# Altium PCB UHF_Reader_MultiFunction_V4.PcbDoc (part 1 of 3)
Units mm, origin at the board's own origin, x right, y up, seen from the top; angles counter-clockwise.
Board outline 74.4 x 63.4 mm, 6 copper layers (Top Layer, Internal Plane 1, Signal Layer 1, Signal Layer 2, Signal Layer 3, Bottom Layer), stack 1.21 mm thick; 381 components, 239 nets, 1152 pads, 1873 vias.
Unrouted connection lines stored in the file: 49.
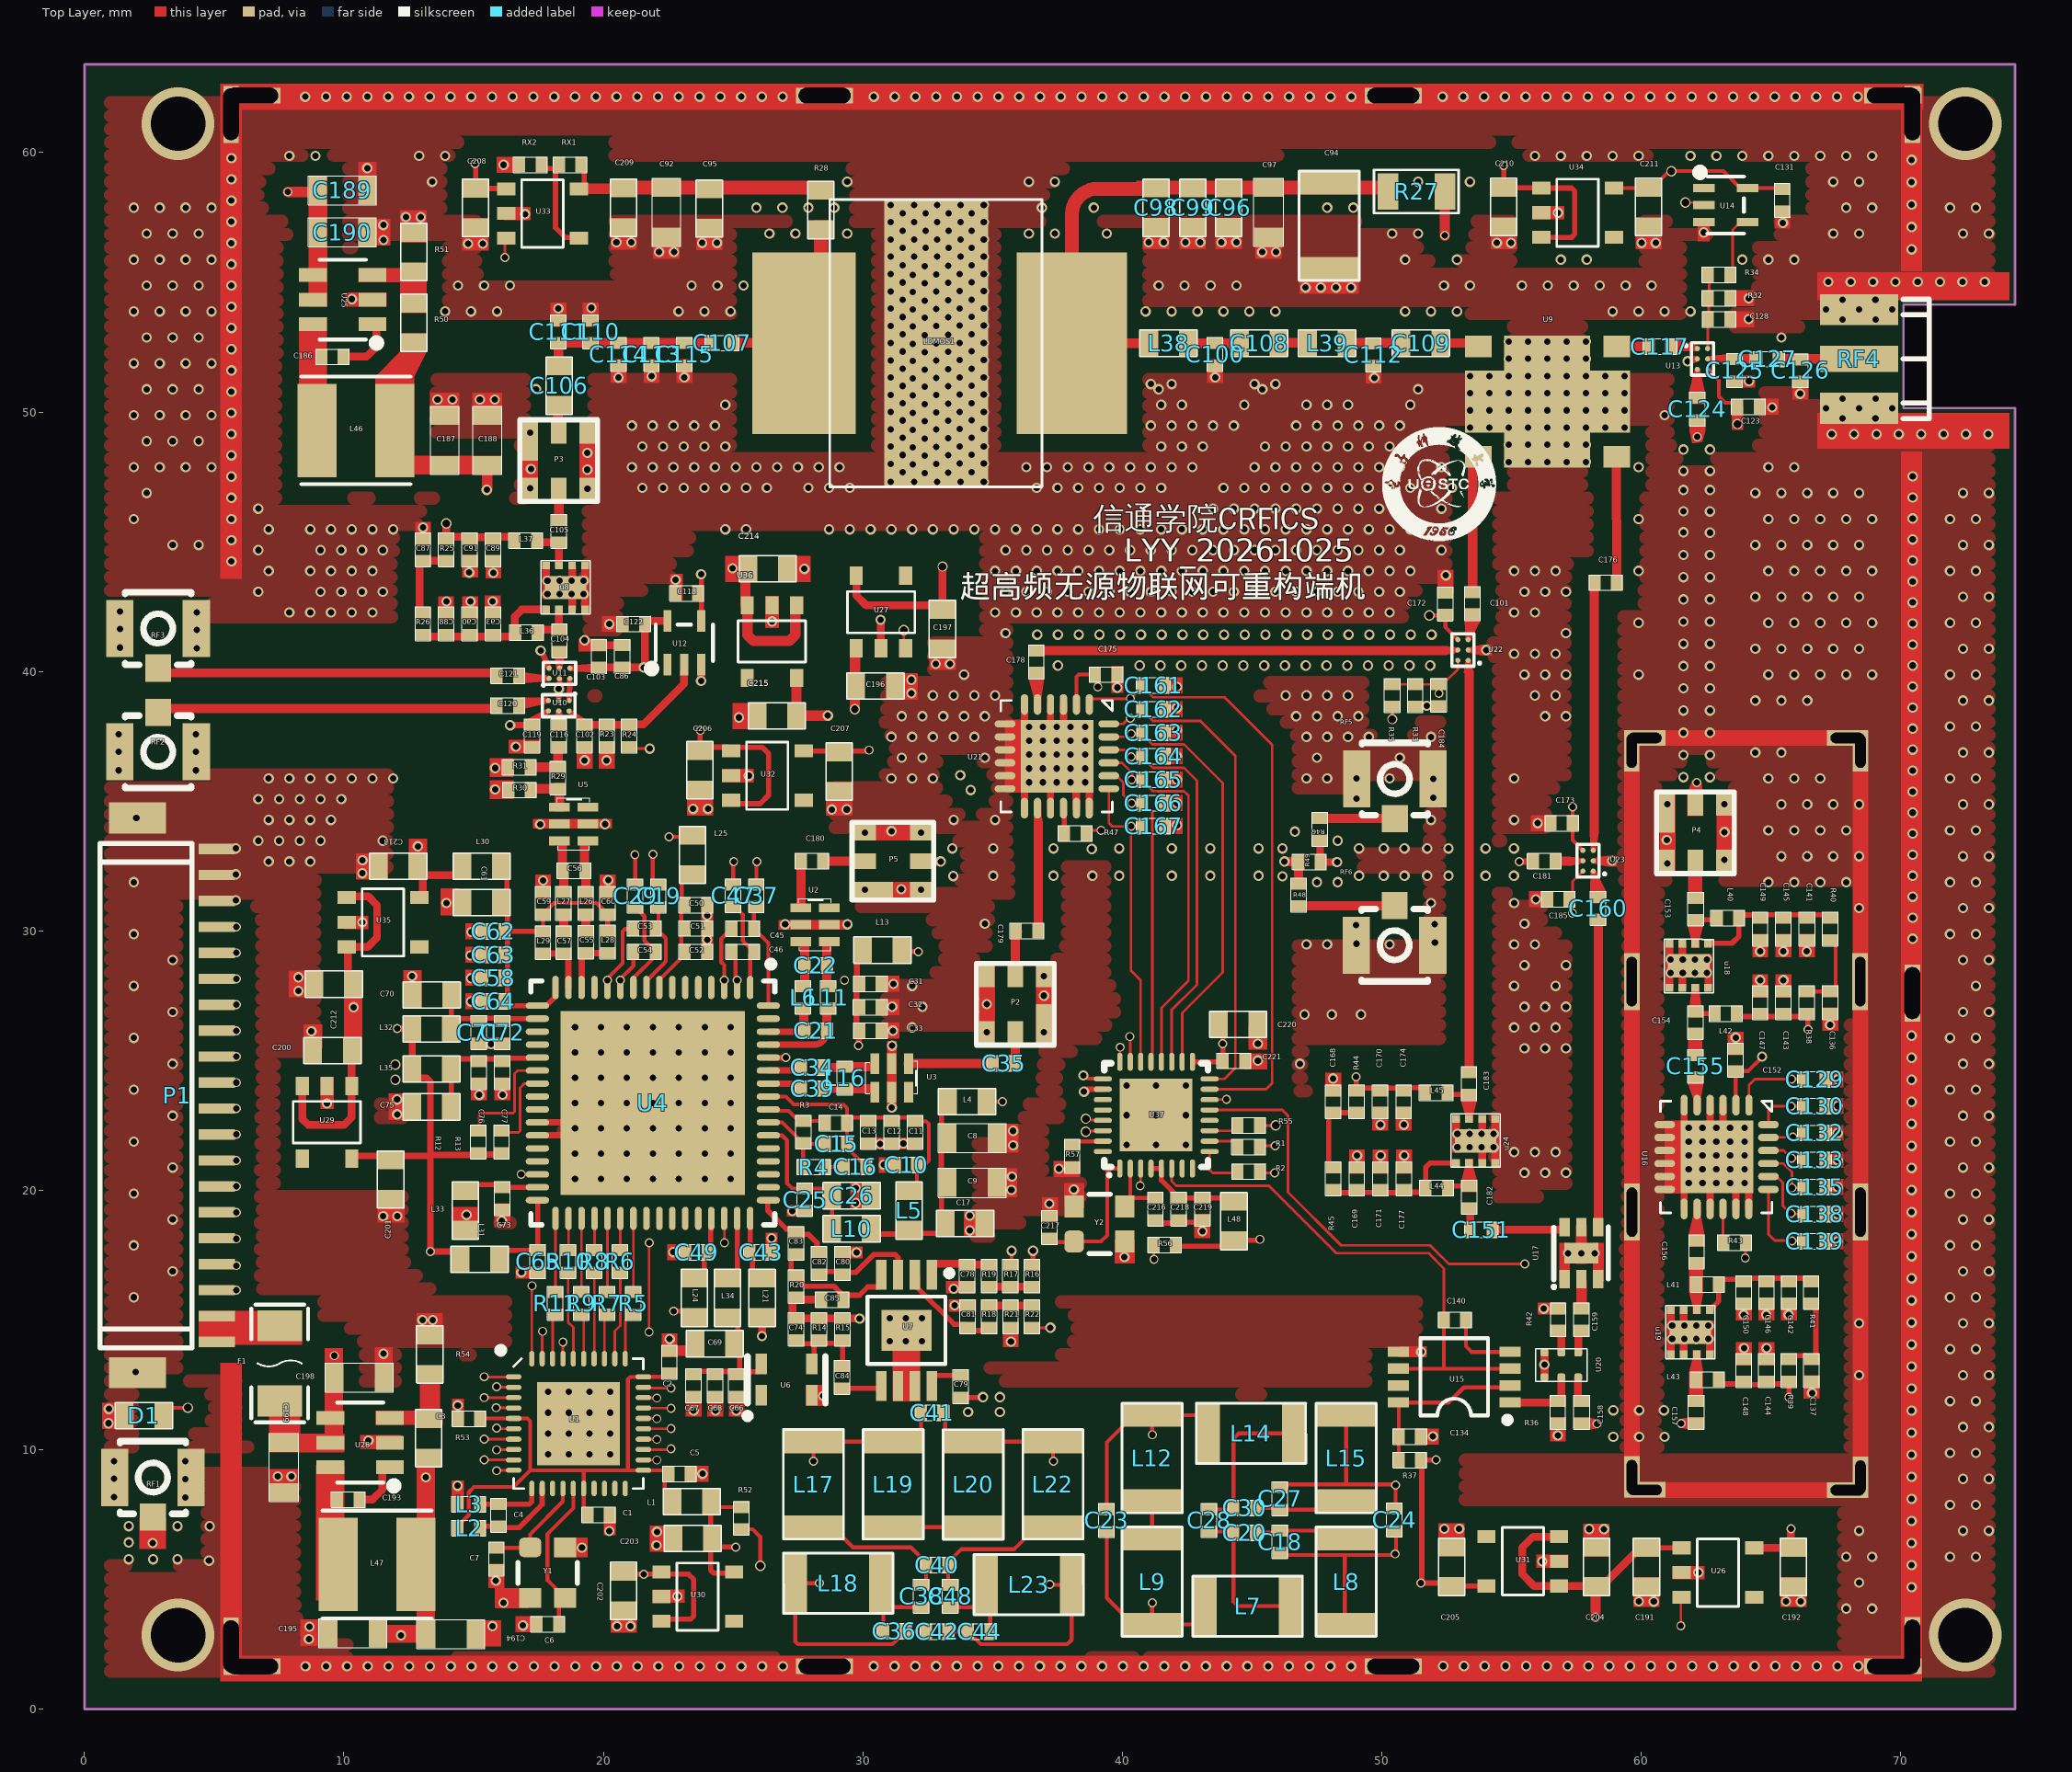
[diagram p0: Top Layer view]
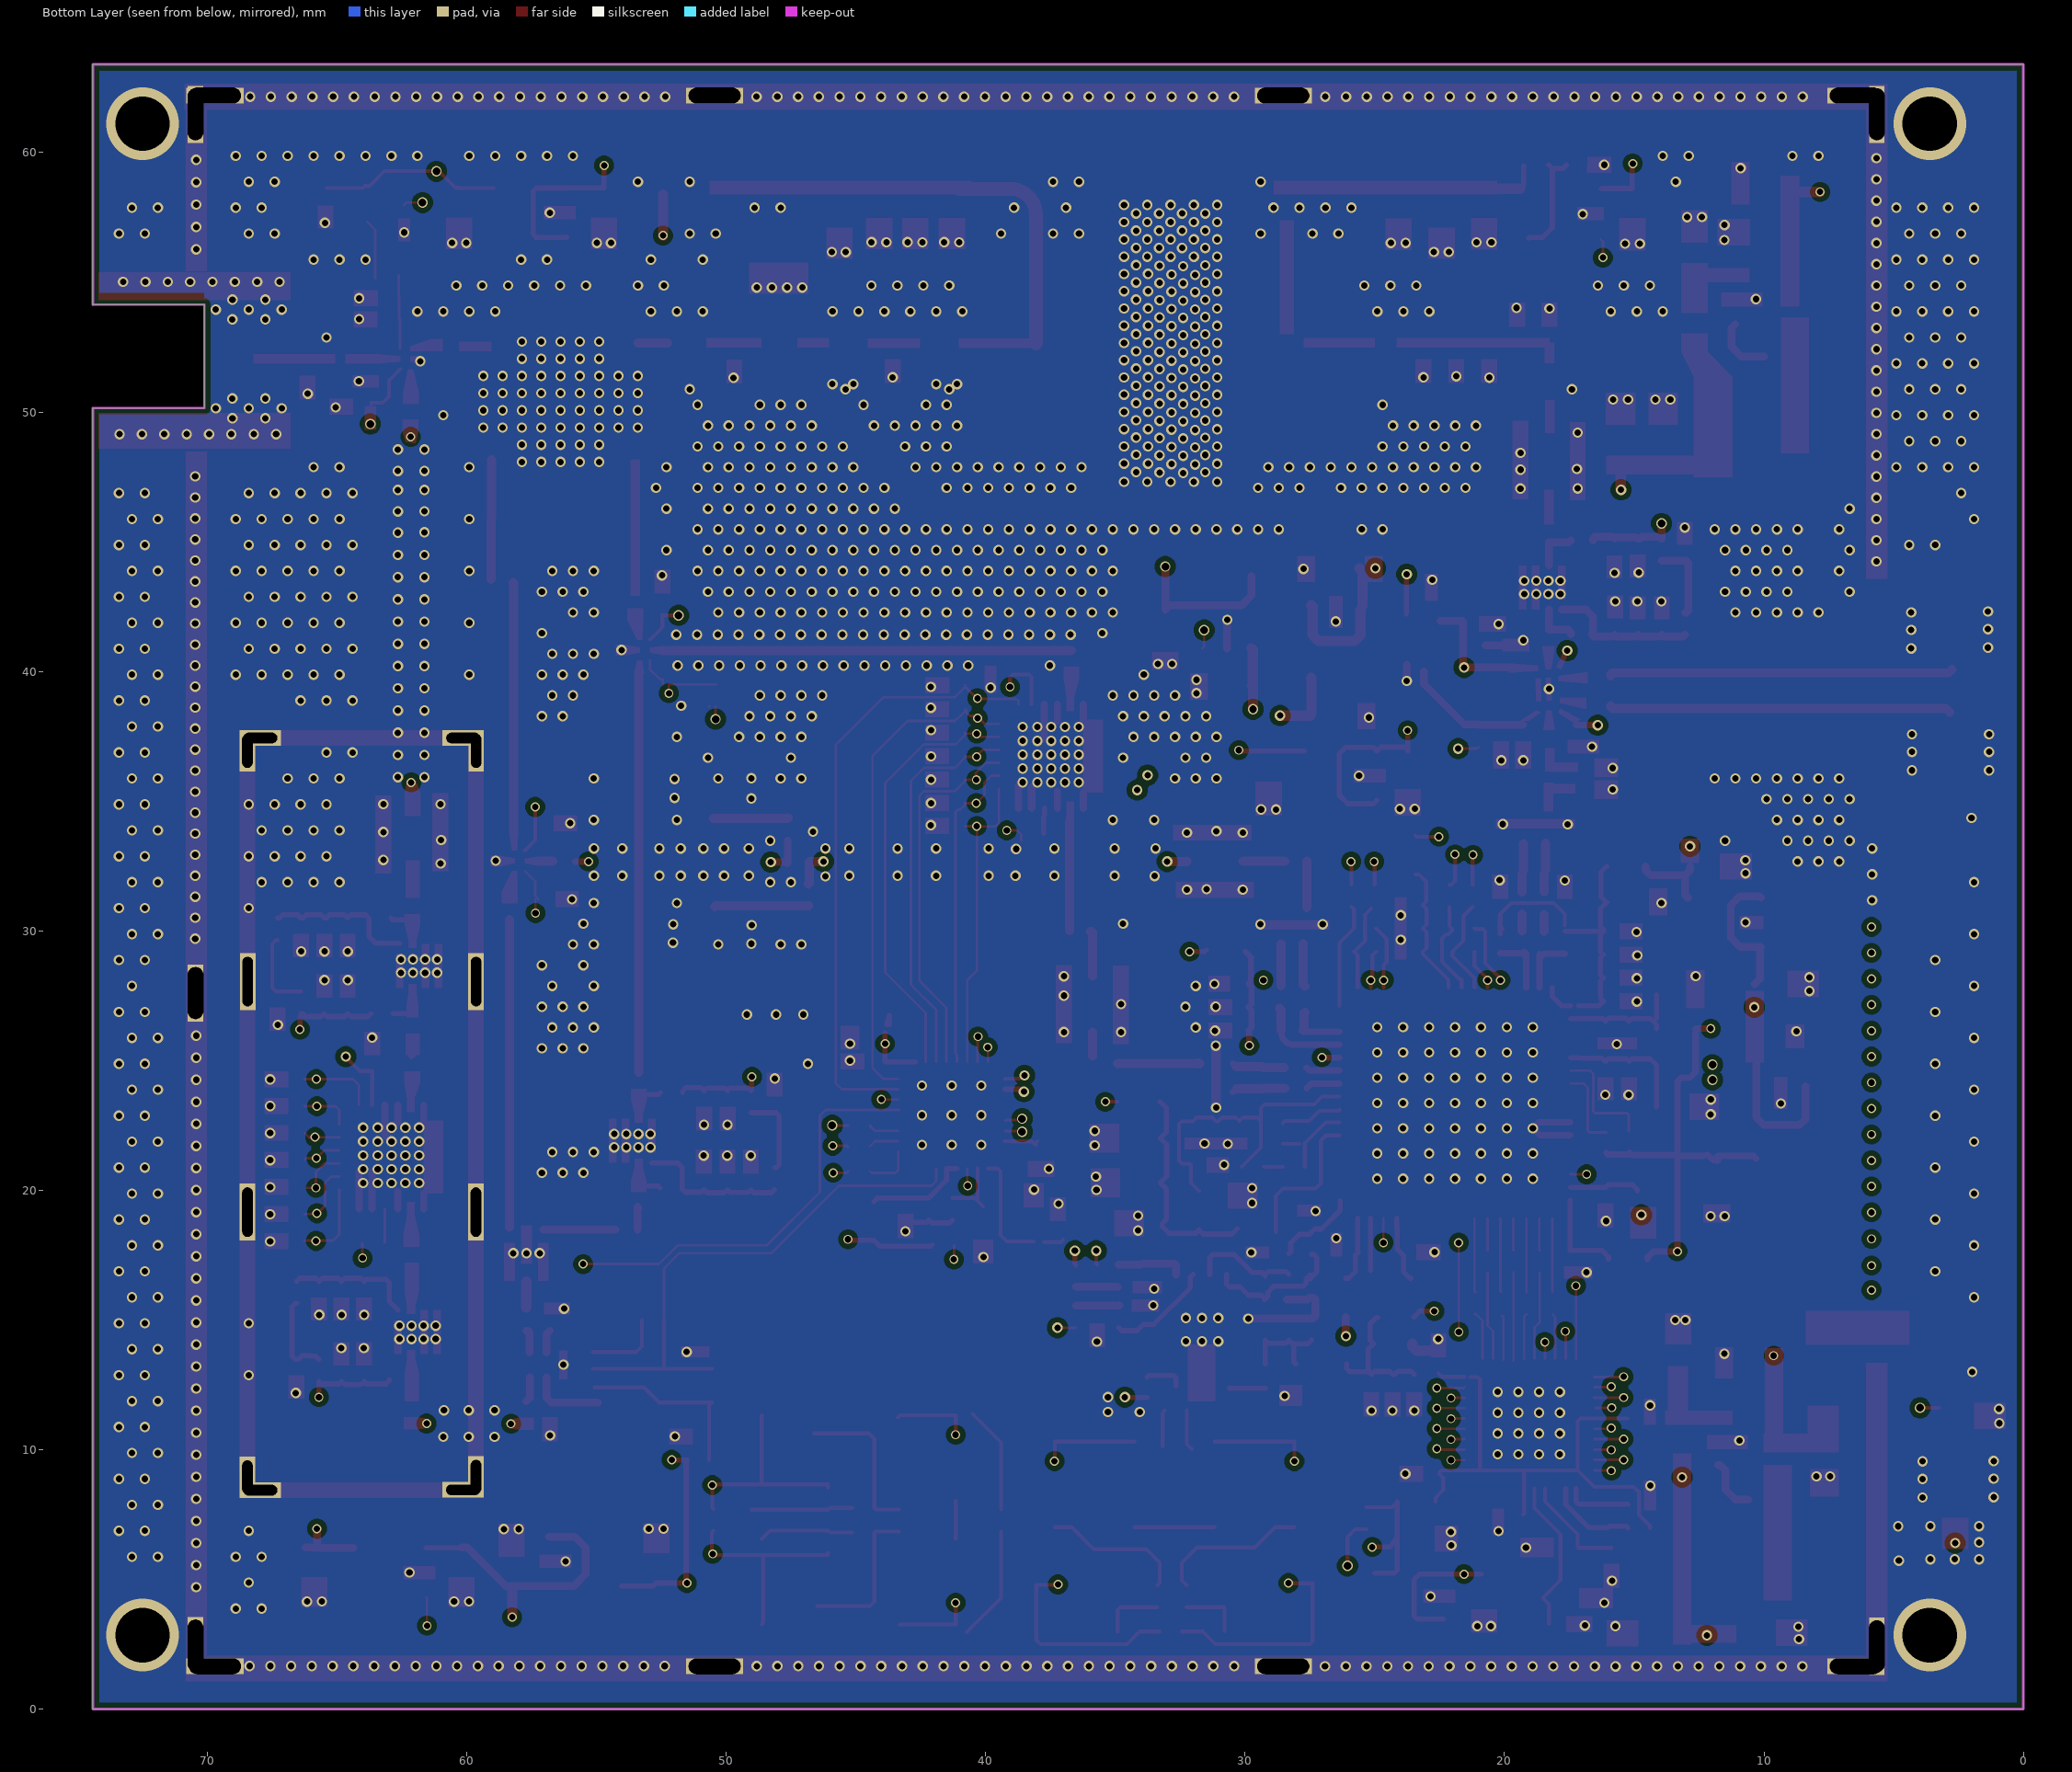
[diagram p1: Bottom Layer view, seen from below]
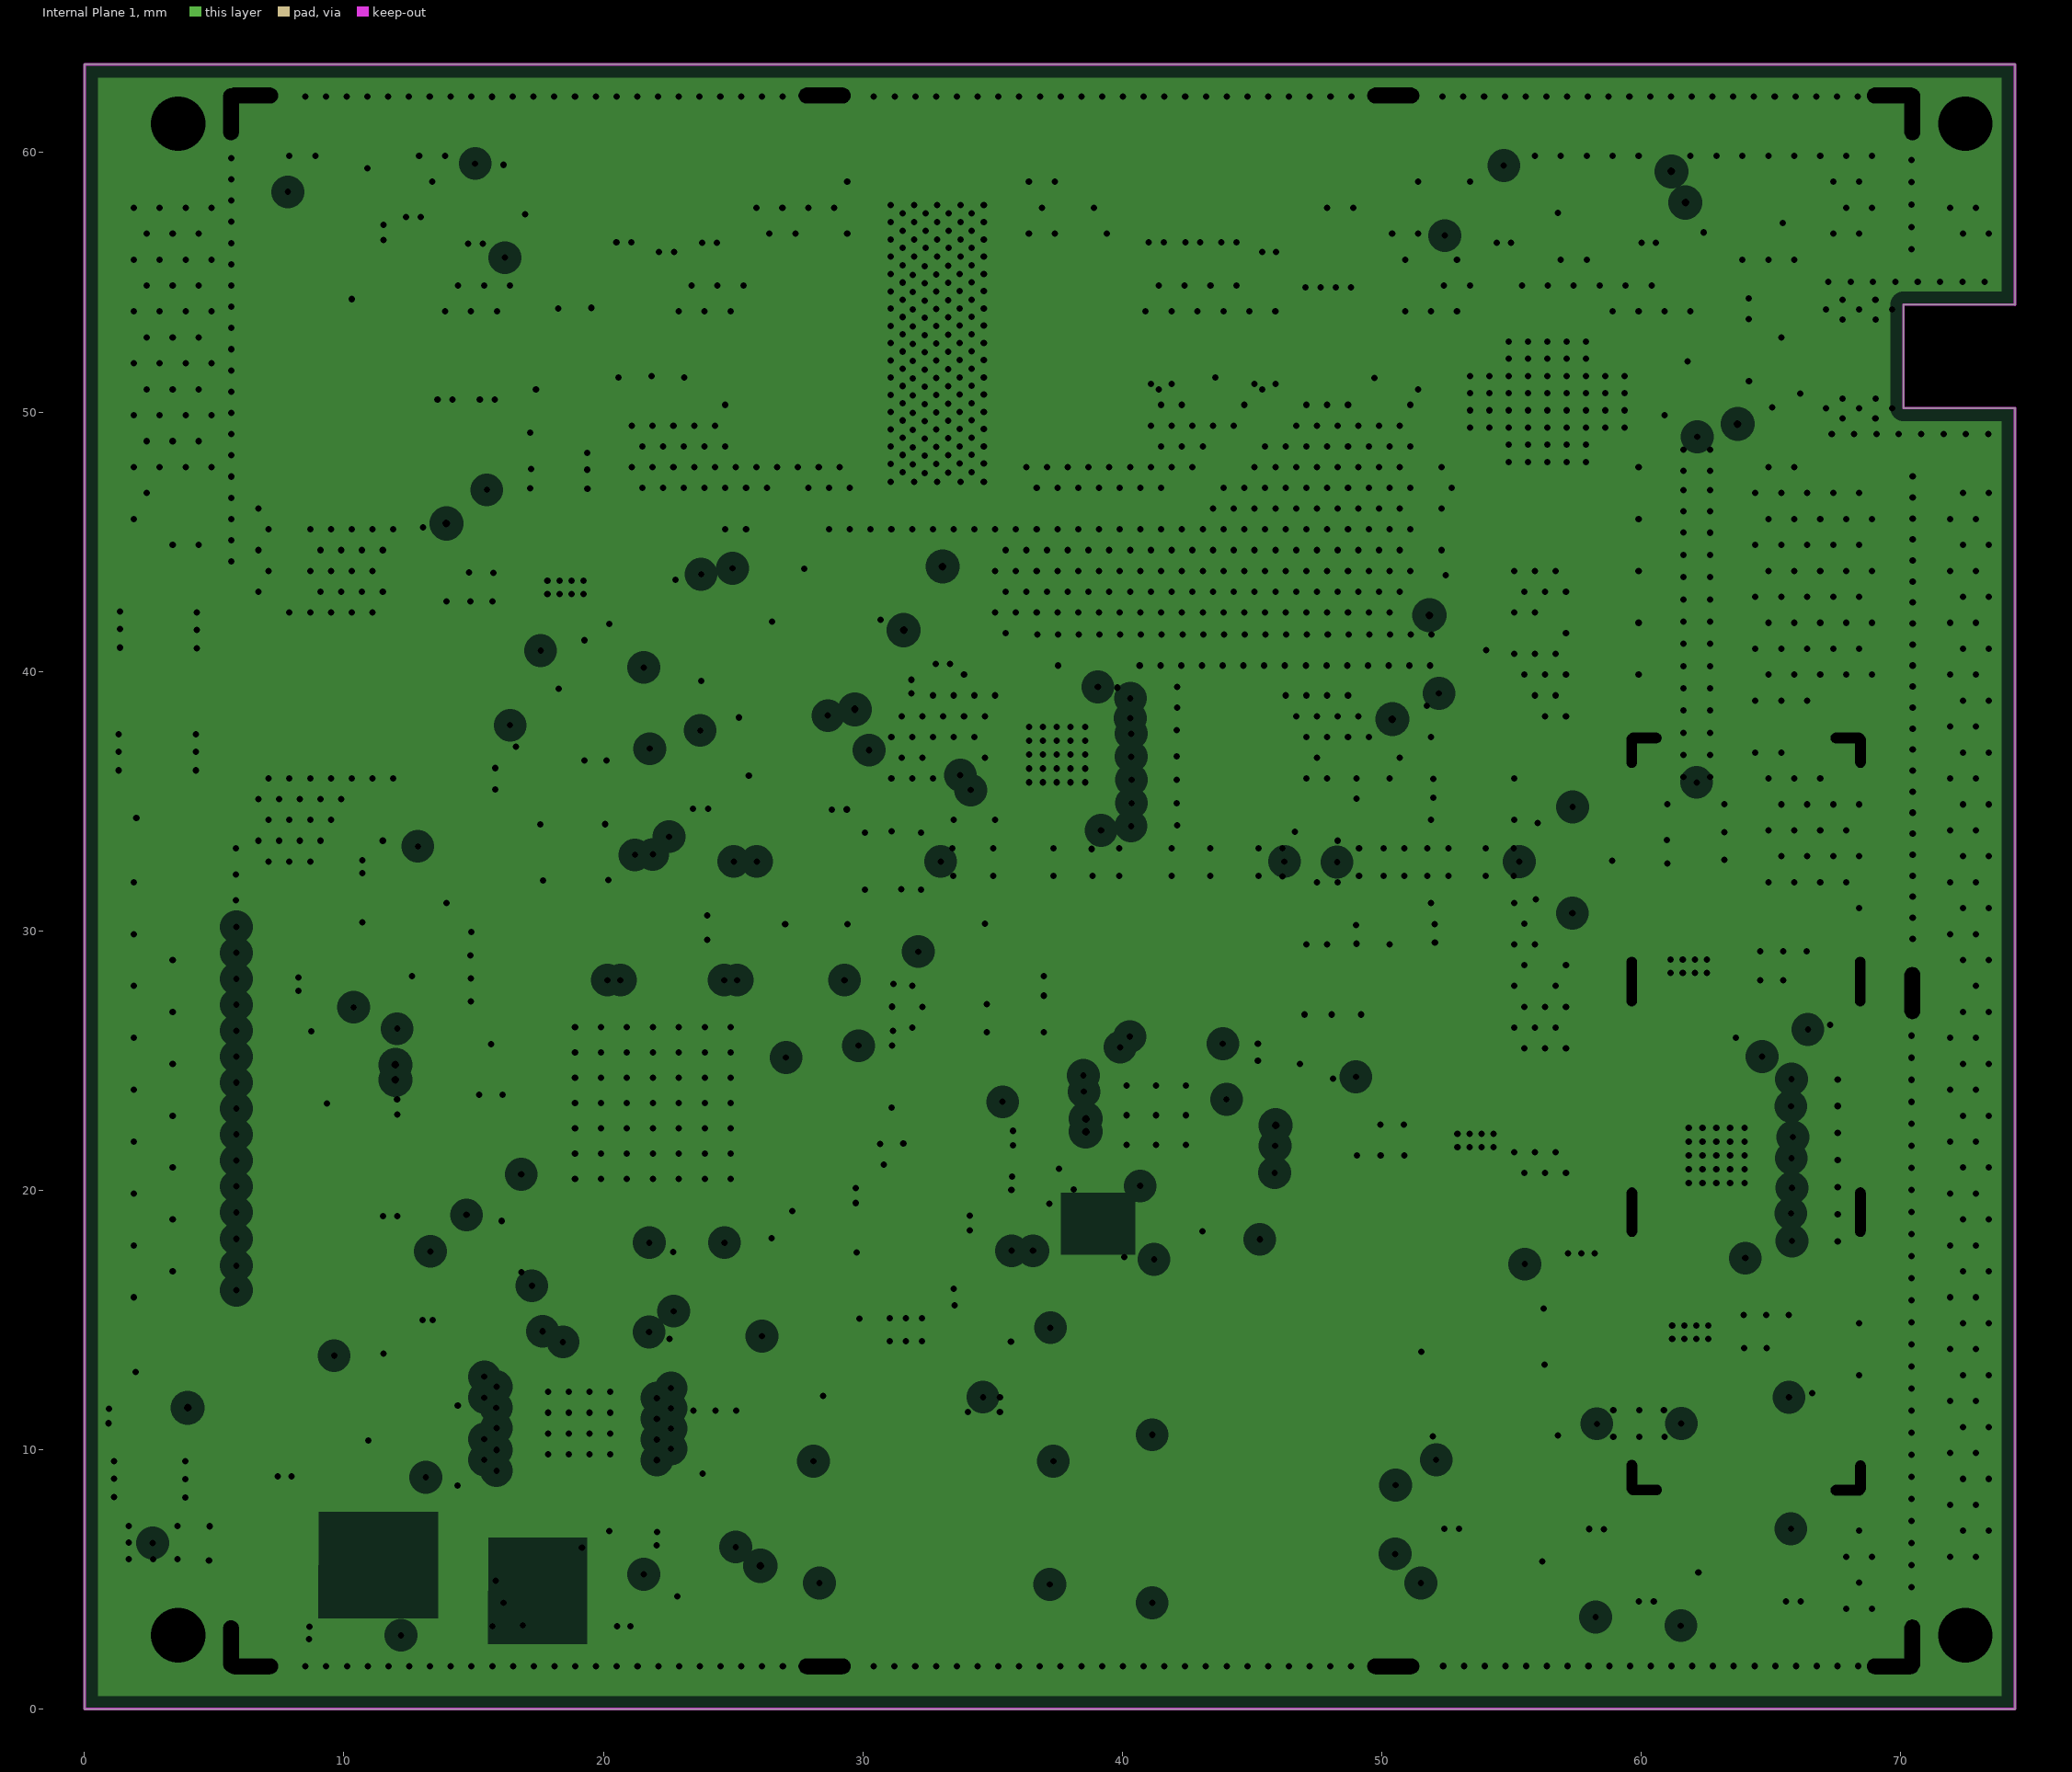
[diagram p2: Internal Plane 1, clearances drawn from the general rule]
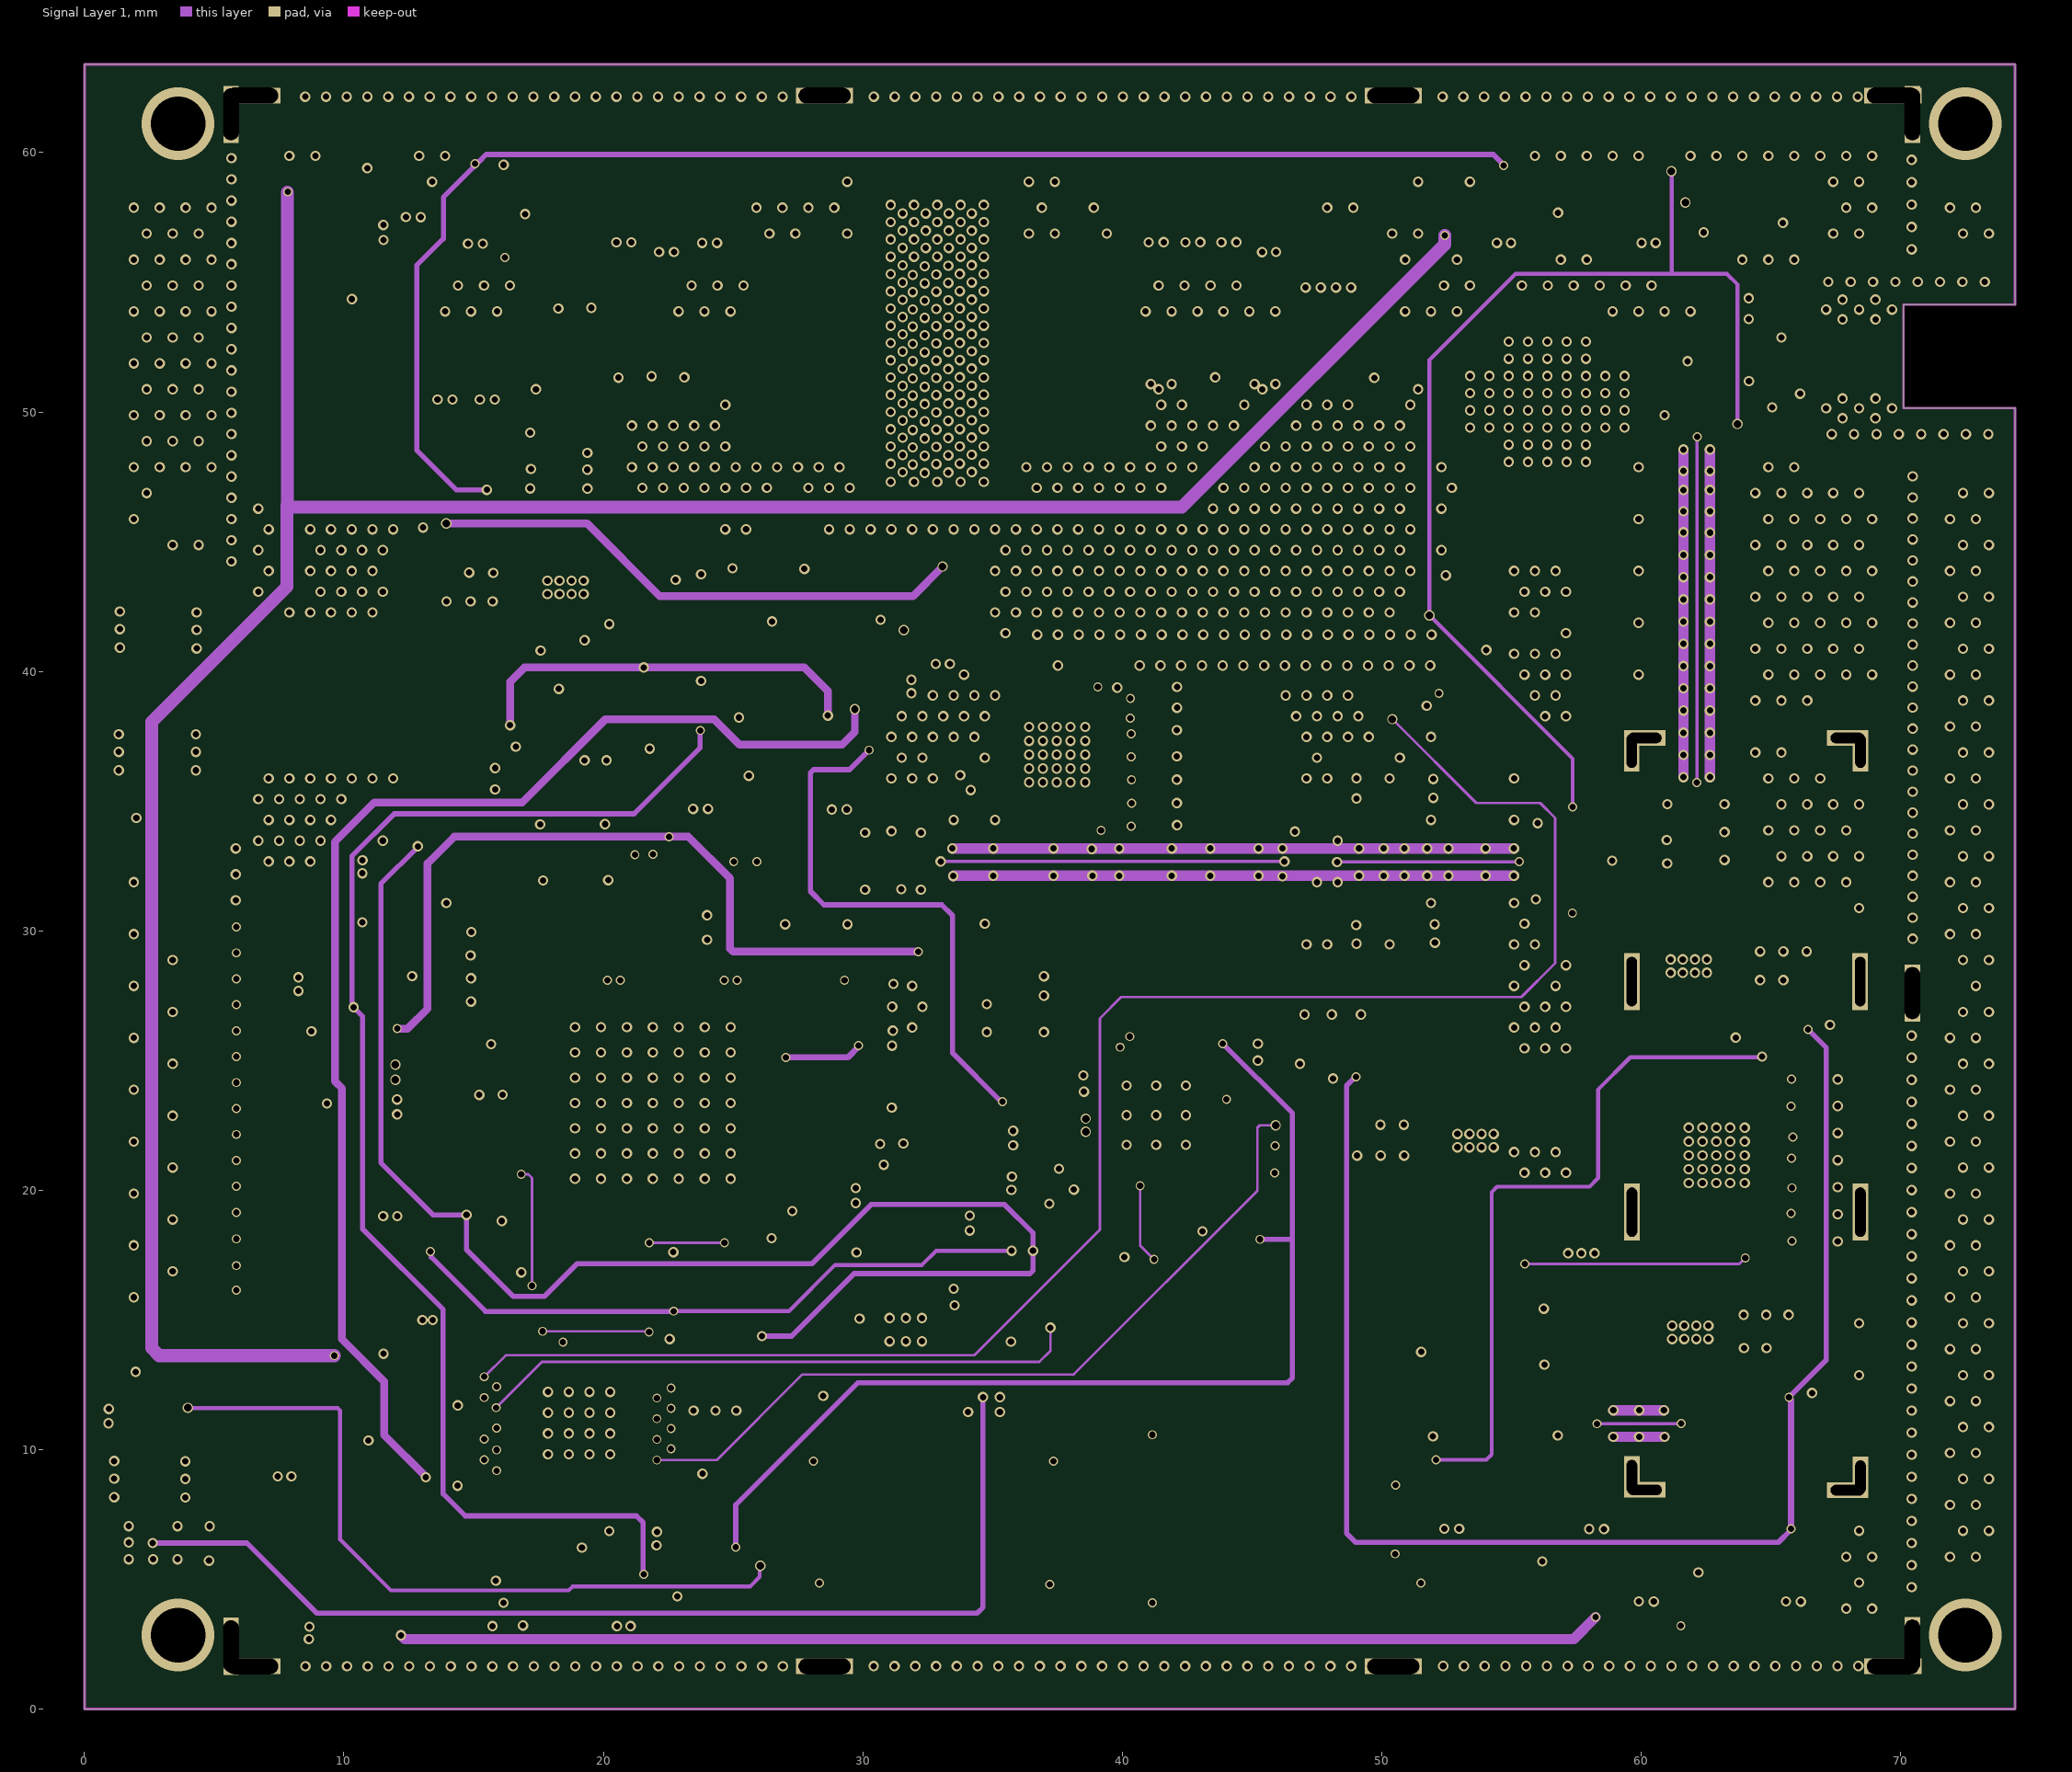
[diagram p3: Signal Layer 1]
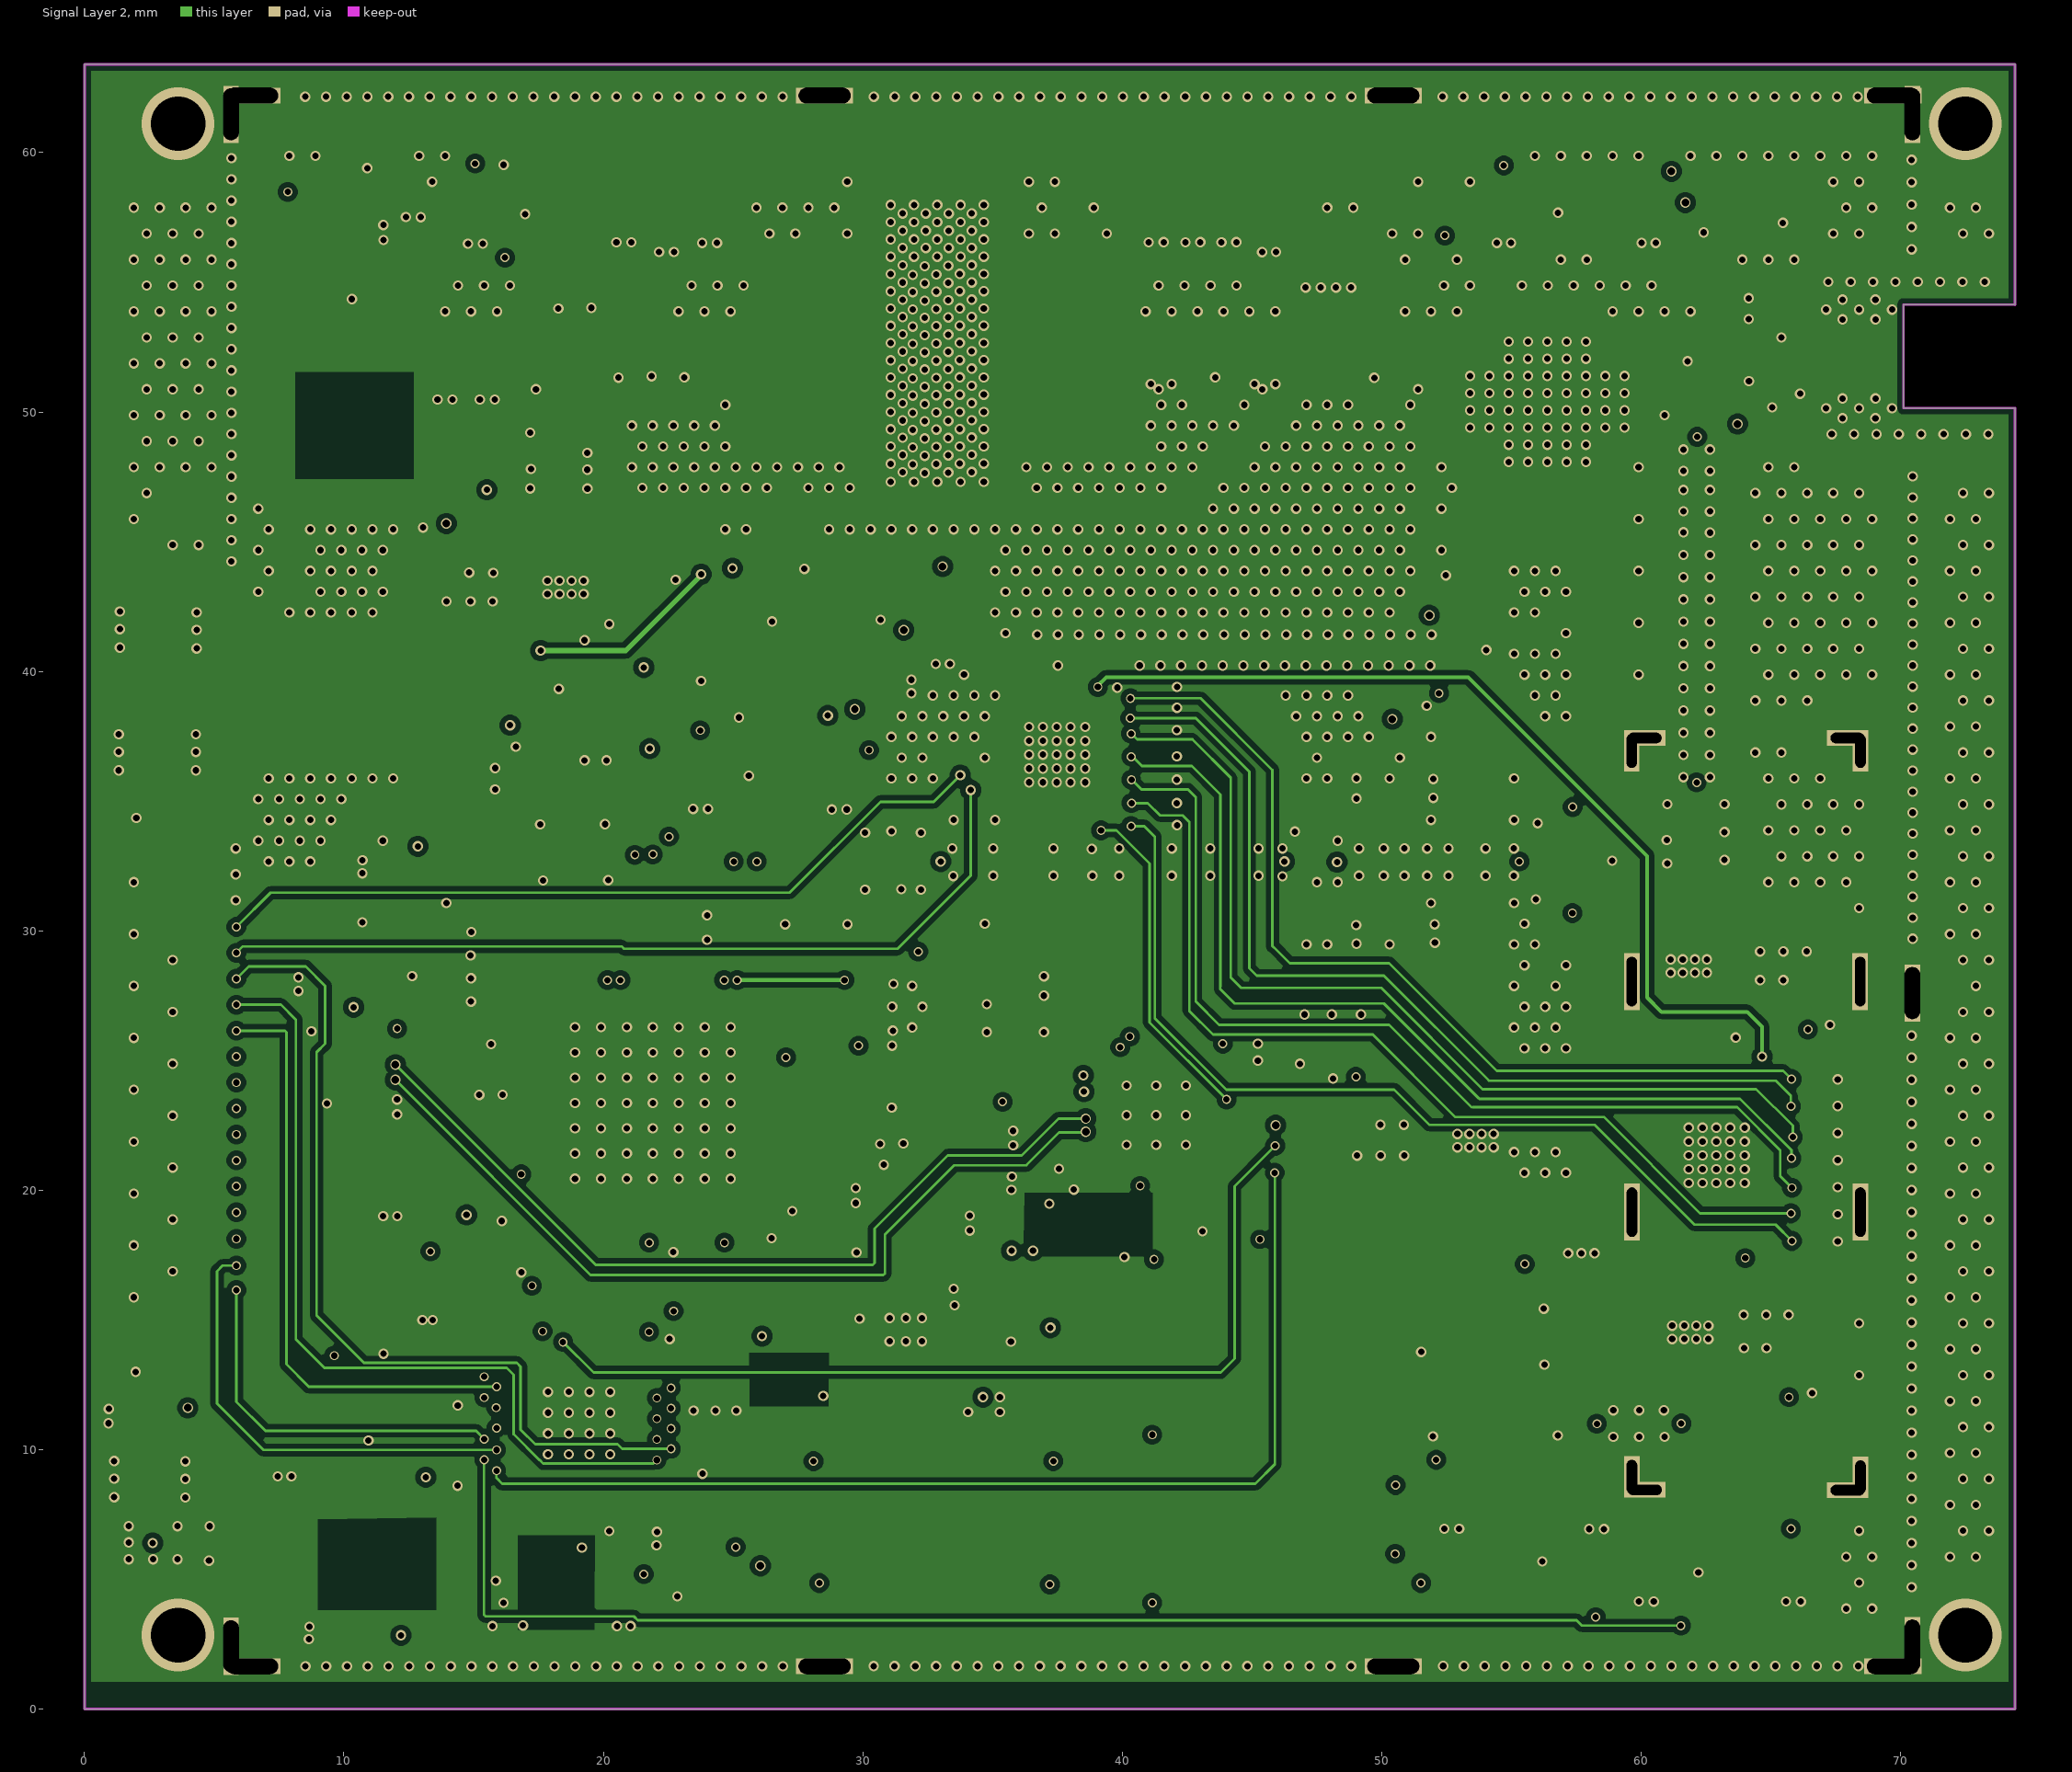
[diagram p4: Signal Layer 2]
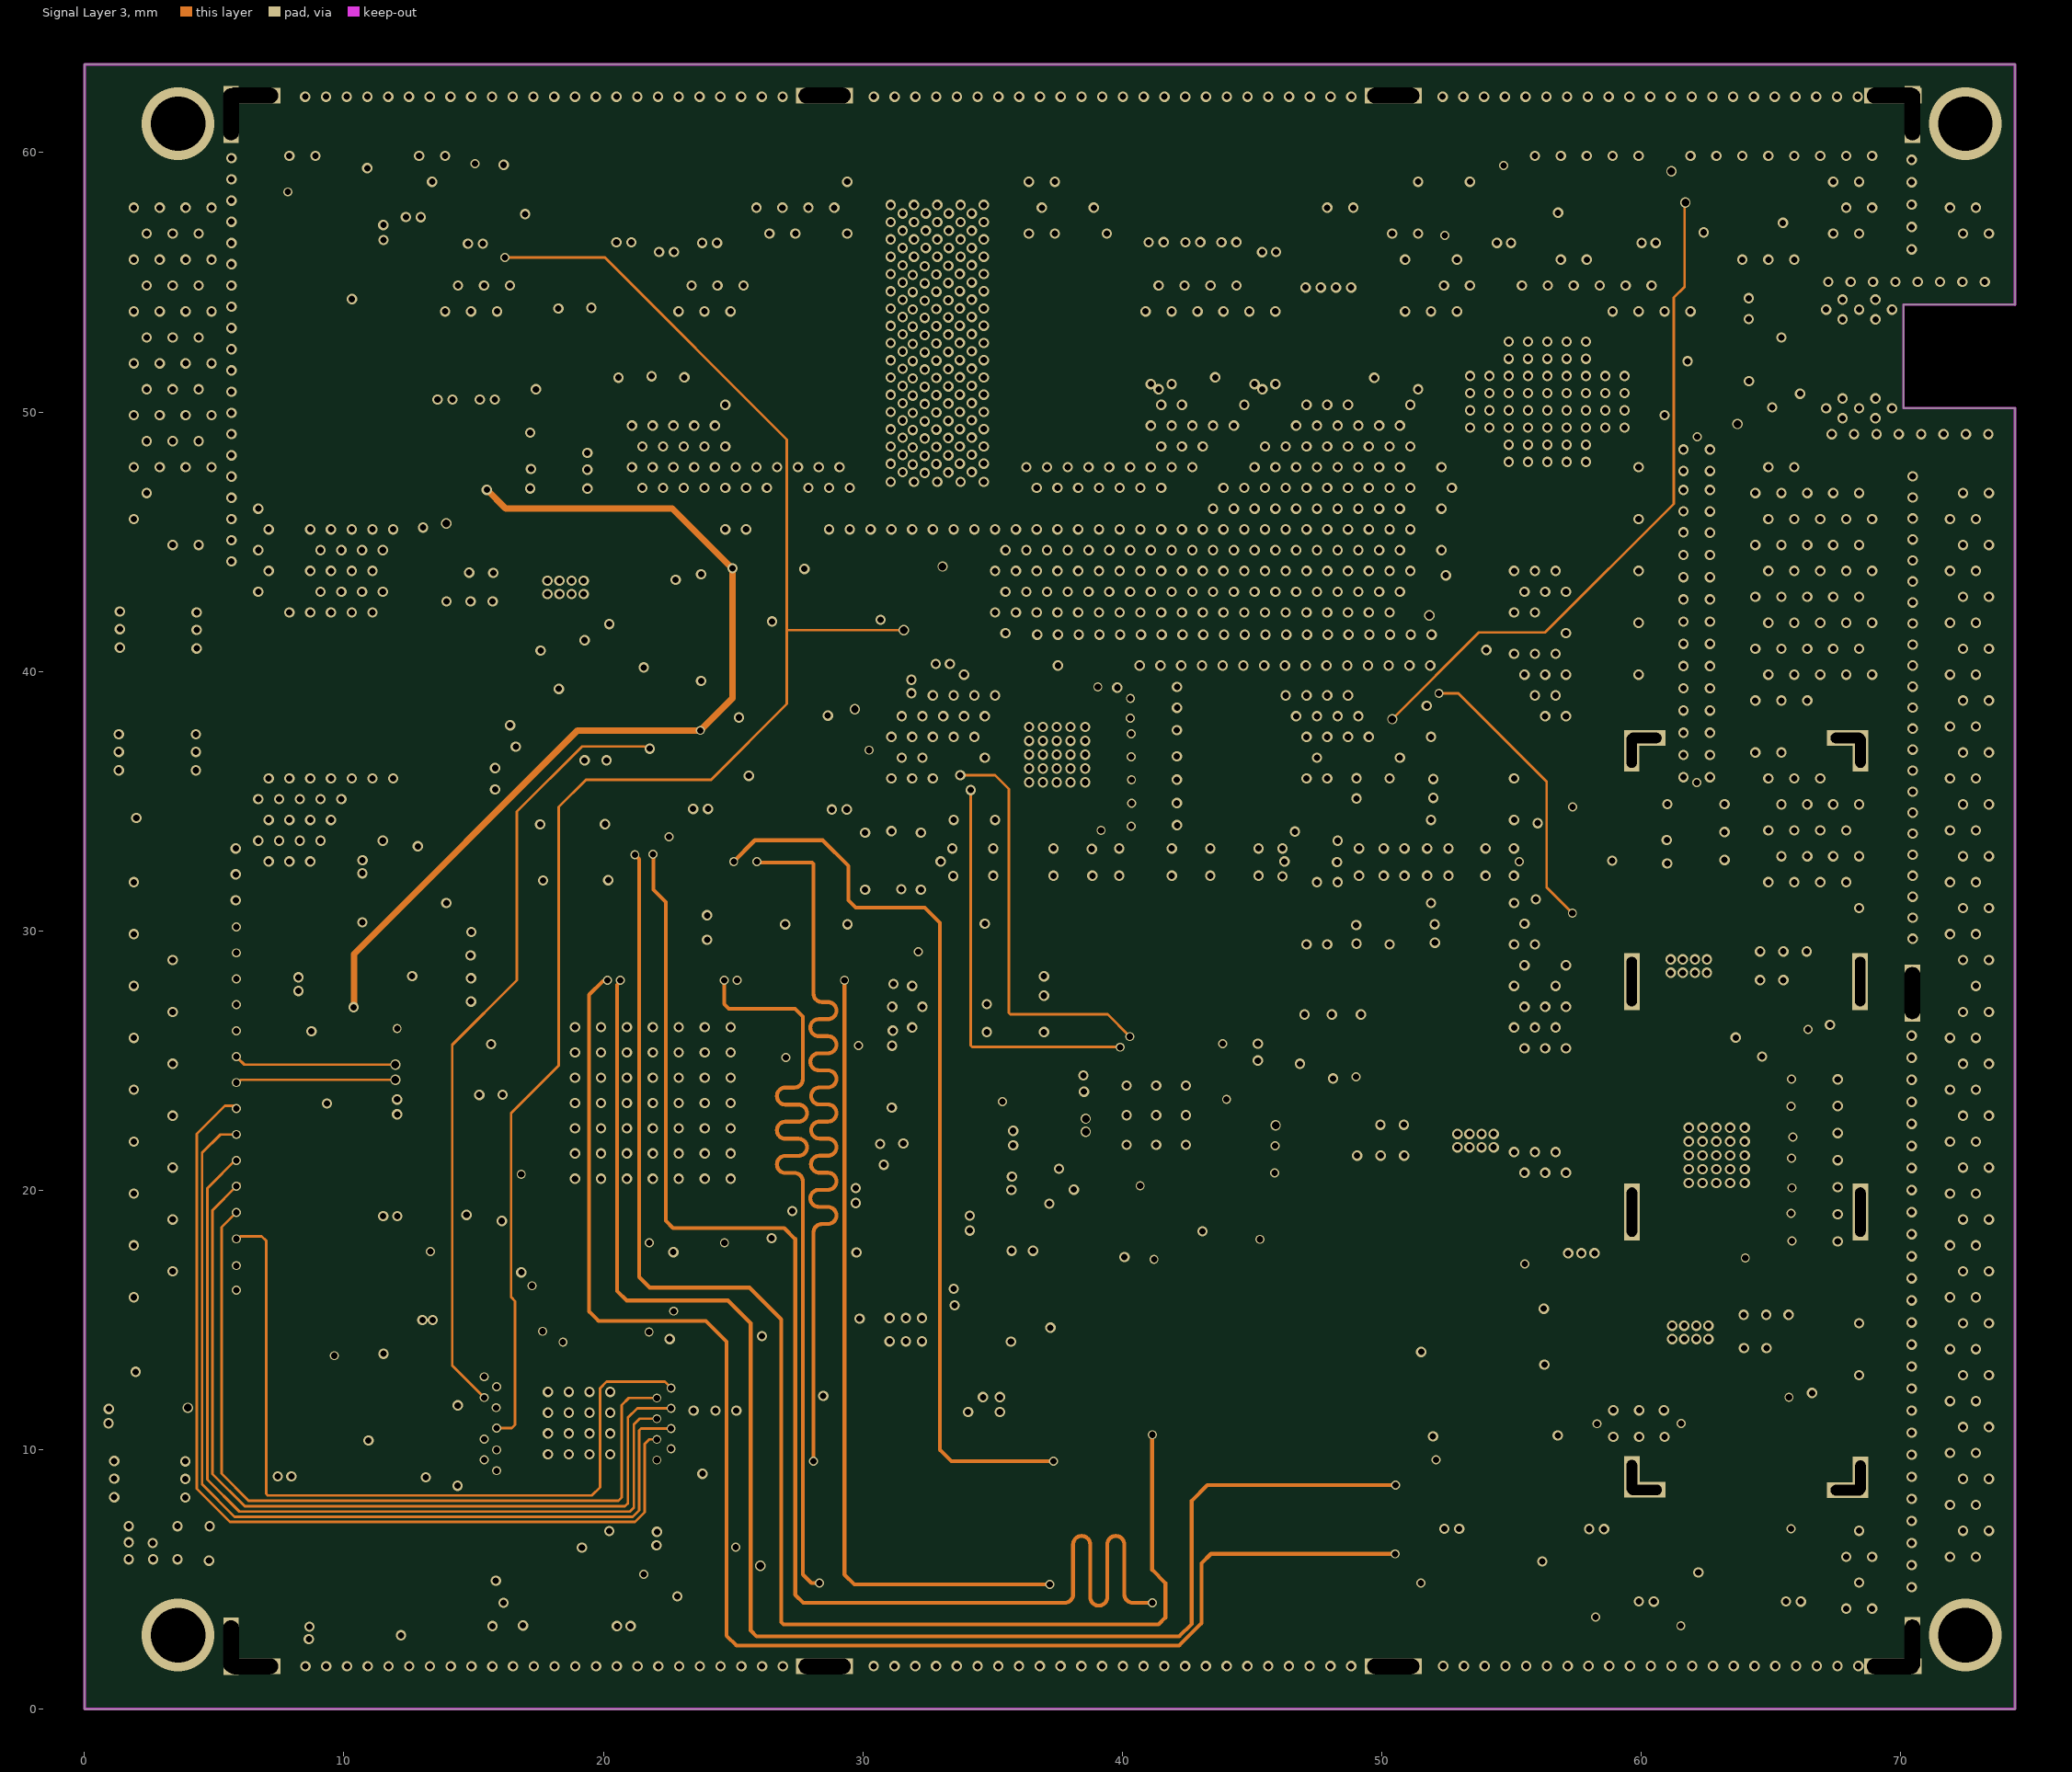
[diagram p5: Signal Layer 3]

## Layer stack, top to bottom
Top Solder: solder mask 0.0102, Solder Resist, Dk 3.5
Top Layer: signal copper 0.035
Dielectric 2: core 0.2, FR-4, Dk 4.4
Internal Plane 1: plane copper 0.035, net GND
Dielectric 1: dielectric 0.2, FR-4, Dk 4.4
Signal Layer 1: signal copper 0.035
Dielectric 4: prepreg 0.2, FR-4, Dk 4.4
Signal Layer 2: signal copper 0.035
Dielectric 5: prepreg 0.2, FR-4, Dk 4.4
Signal Layer 3: signal copper 0.035
Dielectric 3: core 0.2, FR-4, Dk 4.4
Bottom Layer: signal copper 0.035
Bottom Solder: solder mask 0.0102, Solder Resist, Dk 3.5

## Board outline
0.004,0 0.004,0.851 0.004,63.401 74.407,63.401 74.407,54.137 70.107,54.137 70.107,50.154 74.407,50.154 74.407,50.15 74.407,0

## Design rules (kind name [scope] priority, off if disabled: settings)
Clearance Clearance_1 [InNamedPolygon('NONET_L-01_P-TOP')] p1: gap=0.58 ignorepadtopadclearanceinfootprint=FALSE except(0: Arc-Text Arc-Hole Track-Text Track-Hole SMDPad-Text SMDPad-Hole THPad-Text THPad-Hole Via-Text Via-Hole Fill-Text Fill-Hole Poly-Text Poly-Hole Region-Text Region-Hole Text-Text Text-Hole; 0.4: Arc-Arc Arc-Track Arc-SMDPad Arc-THPad Arc-Via Track-Track Track-SMDPad Track-THPad Track-Via SMDPad-SMDPad SMDPad-THPad SMDPad-Via THPad-THPad THPad-Via Via-Via; 0.7: Arc-Fill Arc-Poly Arc-Region Track-Fill Track-Poly Track-Region)
Clearance Clearance_2 [InNamedPolygon('NONET_L-01_P-002')] p2: gap=0.7 ignorepadtopadclearanceinfootprint=FALSE except(0: Arc-Hole Track-Hole SMDPad-Hole THPad-Hole Via-Hole Fill-Hole Poly-Hole Region-Hole Text-Hole; 0.3: Arc-Via Track-Via SMDPad-Via THPad-Via Via-Via)
Clearance GND_Bottom [InNamedPolygon('GND_Bottom')] p3: gap=0.6 ignorepadtopadclearanceinfootprint=TRUE
Clearance Ch341_3V3 [InNamedPolygon('CH341_3V3')] p4: gap=0.5 ignorepadtopadclearanceinfootprint=TRUE
Clearance VSS [InNamedPolygon('VSS')] p5: gap=0.2 ignorepadtopadclearanceinfootprint=TRUE except(0.6: Arc-Fill Arc-Poly Arc-Region Track-Fill Track-Poly Track-Region Fill-Fill Fill-Poly Fill-Region Poly-Poly Poly-Region Region-Region)
Clearance GND [InNamedPolygon('GND_Ploy')] p6: gap=0.4 ignorepadtopadclearanceinfootprint=TRUE except(0.8: Arc-Fill Arc-Poly Arc-Region Track-Fill Track-Poly Track-Region Fill-Fill Fill-Poly Fill-Region Poly-Poly Poly-Region Region-Region)
Clearance DC_GND [InNamedPolygon('DC_Ploy')] p7: gap=0.4 ignorepadtopadclearanceinfootprint=TRUE except(0.8: Arc-Fill Arc-Poly Arc-Region Track-Fill Track-Poly Track-Region Fill-Fill Fill-Poly Fill-Region Poly-Poly Poly-Region Region-Region)
Clearance LNA [InNamedPolygon('LNA')] p8: gap=0.102 ignorepadtopadclearanceinfootprint=TRUE except(0.2: Arc-Arc Arc-Track Track-Track SMDPad-Fill SMDPad-Poly SMDPad-Region THPad-Fill THPad-Poly THPad-Region; 0.8: Arc-Fill Arc-Poly Arc-Region Track-Fill Track-Poly Track-Region Via-Fill Via-Poly Via-Region Fill-Fill Fill-Poly Fill-Region Poly-Poly Poly-Region Region-Region)
Clearance Ploy [InPolygon] p9: gap=0.2 ignorepadtopadclearanceinfootprint=TRUE
Clearance Diff [InNetClass('Diff')] p10: gap=0.152 ignorepadtopadclearanceinfootprint=TRUE
Clearance [All] p11: gap=0.1 ignorepadtopadclearanceinfootprint=TRUE except(0.102: SMDPad-SMDPad; 0.203: SMDPad-THPad)
ComponentClearance [All] p1: gap=0.1 collisioncheckmode=3 verticalgap=0.1 showdistances=FALSE donotcheckwithout3dbody=TRUE
DiffPairsRouting [All] p1: maxlimit=10 minlimit=0.1 mostfreqgap=0.178 toplayer_minwidth=0.128 toplayer_maxwidth=1.016 toplayer_prefwidth=0.422 midlayer1_minwidth=0.128 midlayer1_maxwidth=1.016 midlayer1_prefwidth=0.422 midlayer2_maxgap=0.254 midlayer2_minwidth=0.128 midlayer2_maxwidth=0.381 midlayer2_prefwidth=0.29 midlayer3_maxgap=0.254 midlayer3_minwidth=0.128 midlayer3_maxwidth=0.381 midlayer3_prefwidth=0.29 bottomlayer_minwidth=0.128 bottomlayer_maxwidth=1.016 bottomlayer_prefwidth=0.422 maxuncoupledlength=12.7
HoleSize [All] p1: absolutevalues=TRUE maxlimit=5 minlimit=0.025 maxpercent=80.000 minpercent=20.000
HoleToHoleClearance [All] p1: gap=0 allowstackedmicrovias=TRUE
MatchedLengths [InNetClass('DRM')] p1: tolerance=1.27 checknetsindiffpair=FALSE checkdiffpairvsdiffpair=TRUE checkxsignals=TRUE checkothers=TRUE
MinimumSolderMaskSliver [All] p1: minsoldermaskwidth=0
PlaneClearance [All] p1: clearance=0.508
PlaneConnect [All] p1: planeconnectstyle=Direct reliefexpansion=0.508 reliefentries=4 reliefconductorwidth=0.254 reliefairgap=0.254
PolygonConnect [All] p1: connectstyle=Direct reliefconductorwidth=0.254 reliefentries=4 polygonreliefangle="90 Angle" airgapwidth=0.254
RoutingVias [All] p1: holewidth=0.711 width=1.27 viastyle="Through Hole" minholewidth=0.2 minwidth=0.1 maxholewidth=2.4 maxwidth=5
SilkToSilkClearance [All] p1: silktosilkclearance=0
SilkToSolderMaskClearance [IsPad] p1: minsilkscreentomaskgap=0 clearancetoexposedcopper=TRUE
SolderMaskExpansion [IsVia] p1: expansion=0.102 istentingtop=TRUE
Width [All] p1: maxlimit=5 minlimit=0.1 preferedwidth=0.1 midlayer1_maxwidth=2 midlayer2_maxwidth=0.254 midlayer3_maxwidth=0.254 bottomlayer_maxwidth=0.254 minimp=50.000000 maximp=50.000000 favimp=50.000000
21 further rules are at their usual default settings.

## Classes and differential pairs
component class U_MCU_SLAVE: C210 C212 C214 C219 C220 C221 L48 R55 R56 R57 U37 Y2
component class U_RF_circuit: C86 C87 C88 C89 C90 C91 C92 C93 C94 C95 C96 C97 C98 C99 C100 C101 C102 C103 C104 C105 C106 C107 C108 C109 C110 C111 C112 C113 C114 C115 C116 C117 C118 C119 C120 C121 C122 C123 C124 C125 C126 C127 C128 C129 C130 C131 C132 C133 C134 C135 C136 C137 C138 C139 C140 C141 C142 C143 C144 C145 C146 C147 C148 C149 C150 C151 C152 C153 C154 C155 C156 C157 C158 C159 C160 C161 C162 C163 C164 C165 C166 C167 C168 C169 C170 C171 C172 C173 C174 C175 C176 C177 C178 C179 C180 C181 C182 C183 C184 C185 L36 L37 L38 L39 L40 L41 L42 L43 L44 L45 LDMOS1 P3 P4 P5 R23 R24 R25 R26 R27 R28 R29 R30 R31 R32 R33 R34 R35 R36 R37 R38 R39 R40 R41 R42 R43 R44 R45 R46 R47 R48 R49 RF2 RF3 RF4 RF5 RF6 u8 U9 U10 U11 U12 U13 U14 U15 U16 U17 u18 u19 U20 U21 U22 U23 u24
component class U_Power_Sch: 5 C190 C192 C194 C196 C198 C200 C202 C204 C206 C208 C210 C212 C214 D1 F1 L46 L47 R50 R51 R52 R53 R54 RX1 RX2 U25 U26 U27 U28 U29 U30 U31 U32 U33 U34 U35 U36
component class U_MCU: C1 C2 C3 C4 C5 C6 C7 L1 L2 L3 P1 R1 R2 U1 Y1
component class U_FMRD1616E: 0.5 5 C8 C9 C10 C11 C12 C13 C14 C15 C16 C17 C18 C19 C20 C21 C22 C23 C24 C25 C26 C27 C28 C29 C30 C31 C32 C33 C34 C35 C36 C37 C38 C39 C40 C41 C42 C43 C44 C45 C46 C47 C48 C49 C50 C51 C52 C53 C54 C55 C56 C57 C58 C59 C60 C61 C62 C63 C64 C65 C66 C67 C68 C69 C70 C71 C72 C73 C74 C75 C76 C77 C78 C79 C80 C81 C82 C83 C84 C85 L4 L5 L6 L7 L8 L9 L10 L11 L12 L13 L14 L15 L16 L17 L18 L19 L20 L21 L22 L23 L24 L25 L26 L27 L28 L29 L30 L31 L32 L33 L34 L35 P2 R3 R4 R5 R6 R7 R8 R9 R10 R11 R12 R13 R14 R15 R16 R17 R18 R19 R20 R21 R22 RF1 U2 U3 U4 U5 U6 U7

## Components (designator, comment, footprint, x,y, rotation, side; value= is the part's Value field where it differs from the comment)
C1 "100nF" 0402_Z#1 19.828,7.48 r180 top value=0.1uF
C2 "100nF" 0402_Z#1 22.555,13.381 r270 top value=0.1uF
C3 "100nF" 0402_Z#1 14.829,11.192 r180 top value=0.1uF
C4 "0.1uF" 0402_Z#1 15.975,7.48 r270 top
C5 "0.1uF" 0402_Z#1 22.949,9.064 r180 top
C6 "20pF  NP0" 0402_Z#1 17.854,3.286 r0 top
C7 "20pF  NP0" 0402_Z#1 15.879,5.801 r270 top
C8 "100uF" 0805_Z 34.215,22.01 r180 top
C9 "100uF" 0805_Z 34.215,20.29 r180 top
C10 "10uF" 0402_Z#1 31.669,20.971 r180 top
C11 "1uF" 0402_Z#1 32.025,22.242 r270 top
C12 "100nF" 0402_Z#1 31.121,22.242 r270 top
C13 "68pF" 0402_Z#1 30.227,22.25 r270 top
C14 "1nF" 0402_Z#1 28.976,22.59 r180 top
C15 "1nF" 0402_Z#1 28.976,21.784 r180 top
C16 "22nF" 0402_Z#1 29.707,20.906 r180 top
C17 "10uF" 0603_Z#1 33.954,18.704 r0 top
C18 "NC" 0402_Z#1 46.073,6.446 r90 top
C19 "100nF" 0402_Z#1 22.13,31.357 r270 top
C20 "0R" 0402_Z#1 44.724,6.801 r180 top
C21 "1.8pF" 0402_Z#1 28.175,26.161 r0 top value=100pF
C22 "NC" 0402_Z#1 28.175,28.674 r0 top value=100pF
C23 "75pF" 0402_Z#1 39.396,7.266 r90 top
C24 "1nF" 0402_Z#1 50.48,7.286 r90 top
C25 "68pF" 0402_Z#1 27.767,19.649 r270 top
C26 "10uF" 0603_Z#1 29.573,19.777 r0 top
C27 "NC" 0402_Z#1 46.085,8.12 r270 top
C28 "1nF" 0402_Z#1 43.344,7.266 r90 top
C29 "100nF" 0402_Z#1 21.235,31.36 r270 top
C30 "0R" 0402_Z#1 44.724,7.752 r180 top
C31 "1uF" 0402_Z#2 30.282,27.952 r0 top value=100pF
C32 "68pF" 0402_Z#2 30.282,27.053 r0 top value=100pF
C33 "10 pF" 0402_Z#2 30.282,26.151 r0 top value=100pF
C34 "1 nF" 0402_Z#1 28.065,24.731 r180 top value=100pF
C35 "100pF" 0402_Z#1 35.439,24.888 r180 top
C36 "NC" 0402_Z#1 31.221,3 r180 top
C37 "100nF" 0402_Z#1 25.904,31.368 r270 top
C38 "0R" 0402_Z#1 32.25,4.345 r90 top
C39 "1 nF" 0402_Z#1 28.059,23.924 r180 top value=100pF
C40 "1nF" 0402_Z#1 32.855,5.566 r0 top
C41 "75pF" 0402_Z#1 32.657,11.426 r0 top
C42 "1nF" 0402_Z#1 32.855,3 r0 top
C43 "1 uF" 0402_Z#1 26.053,17.616 r0 top value=100pF
C44 "NC" 0402_Z#1 34.478,3 r0 top
C45 "100nF" 0402_Z#1 25.365,30.099 r0 top
C46 "100nF" 0402_Z#1 25.365,29.201 r0 top
C47 "100nF" 0402_Z#1 25.009,31.368 r270 top
C48 "0R" 0402_Z#1 33.37,4.345 r90 top
C49 "100nF" 0402_Z#1 23.597,17.601 r180 top value=100pF
C50 "1uF" 0402_Z#1 23.563,31 r0 top value=100pF
C51 "68pF" 0402_Z#1 23.563,30.103 r0 top value=100pF
C52 "10 pF" 0402_Z#1 23.563,29.201 r0 top value=100pF
C53 "100nF" 0402_Z#1 21.576,30.103 r0 top
C54 "100nF" 0402_Z#1 21.578,29.201 r0 top
C55 "33 pF" 0402_Z#1 19.333,29.575 r270 top value=100pF
C56 "12 pF" 0402_Z#1 18.863,32.331 r0 top value=100pF
C57 "33 pF" 0402_Z#1 18.478,29.557 r270 top value=100pF
C58 "68pF" 0402_Z#1 15.751,28.193 r0 top value=100pF
C59 "33 pF" 0402_Z#1 17.67,31.06 r90 top value=100pF
C60 "33 pF" 0402_Z#1 20.177,31.078 r270 top value=100pF
C61 "10uF" 0603_Z#1 15.297,31.108 r180 top value=100pF
C62 "100 nF" 0402_Z#1 15.769,29.973 r180 top value=100pF
C63 "1 nF" 0402_Z#1 15.769,29.077 r180 top value=100pF
C64 "100 pF" 0402_Z#1 15.751,27.297 r0 top value=100pF
C65 "1uF" 0402_Z#1 17.465,17.249 r90 top value=100pF
C66 "100 pF" 0402_Z#1 25.137,12.486 r270 top value=100pF
C67 "1nF" 0402_Z#1 23.486,12.486 r270 top value=100pF
C68 "100nF" 0402_Z#1 24.312,12.486 r270 top value=100pF
C69 "1uF" 0603_Z#1 24.282,14.101 r180 top value=100pF
C70 "10uF" 0603_Z#1 13.374,27.543 r180 top value=100pF
C71 "100nF" 0402_Z#1 15.213,26.098 r270 top value=100pF
C72 "68 pF" 0402_Z#1 16.116,26.098 r270 top value=100pF
C73 "1uF" 0402_Z#1 16.103,19.677 r90 top value=100pF
C74 "10pF" 0402_Z#1 27.445,14.651 r270 top value=100pF
C75 "10uF" 0603_Z#1 13.369,23.229 r180 top value=100pF
C76 "100nF" 0402_Z#1 15.206,24.55 r270 top value=100pF
C77 "68 pF" 0402_Z#1 16.109,24.551 r270 top value=100pF
C78 "100pF" 0402_Z#1 34.034,16.711 r270 top
C79 "1uF" 0402_Z#1 33.782,12.451 r270 top value=100pF
C80 "100pF" 0402_Z#1 29.232,17.194 r270 top
C81 "100pF" 0402_Z#1 34.034,15.125 r90 top
C82 "1uF" 0402_Z#1 28.307,17.176 r90 top value=100pF
C83 "1uF" 0402_Z#1 27.432,17.951 r90 top value=100pF
C84 "1uF" 0402_Z#1 29.207,12.801 r270 top value=100pF
C85 "100pF" 0402_Z#1 28.832,15.776 r180 top
C86 "100 pF" 0402_Z#1 20.732,40.576 r90 top value=100pF
C87 "100 pF" 0402_Z#1 13.055,44.697 r270 top value=100pF
C88 "100nF" 0402_Z#2 13.957,41.828 r90 top value=100pF
C89 "100nF" 0402_Z#1 15.762,44.697 r270 top value=100pF
C90 "1nF" 0402_Z#2 14.86,41.828 r90 top value=100pF
C91 "100 pF" 0402_Z#1 14.86,44.697 r270 top value=100pF
C92 "10uF" 0805_Z 22.425,57.699 r270 top value=100pF
C93 "100 pF" 0402_Z#2 15.762,41.828 r90 top value=100pF
C94 "100nF" 1210_Z 47.968,57.178 r270 top value=100pF
C95 "47pF" 0603_Z#1 24.07,57.831 r270 top value=100pF
C96 "NC" 0603_Z#1 44.087,57.858 r270 top value=100pF
C97 "47pF" 0805_Z 45.633,57.699 r90 top value=100pF
C98 "NC" 0603_Z#1 41.285,57.858 r270 top value=100pF
C99 "NC" 0603_Z#1 42.7,57.858 r270 top value=100pF
C100 "8.2pF" 0402_Z#1 43.581,52.239 r270 top value=100pF
C101 "100 pF" 0402_Z#1 53.494,42.616 r90 top value=100pF
C102 "100 pF" 0402_Z#1 19.282,37.519 r270 top value=100pF
C103 "100 pF" 0402_Z#1 19.832,40.576 r90 top value=100pF
C104 "100 pF" 0402_Z#1 18.307,41.176 r90 top value=100pF
C105 "100 pF" 0402_Z#1 18.284,45.396 r90 top value=100pF
C106 "100pF" 0603_Z#1 18.282,51.001 r270 top
C107 "47pF" 0402_Z#1 24.585,52.655 r180 top value=100pF
C108 "47pF" 0603_Z#1 45.27,52.665 r180 top value=100pF
C109 "100pF" 0603_Z#1 51.494,52.665 r180 top
C110 "NC" 0402_Z#1 19.523,53.104 r270 top value=100pF
C111 "10pF" 0402_Z#1 18.278,53.104 r270 top value=100pF
C112 "0.9pF" 0402_Z#1 49.677,52.203 r90 top value=100pF
C113 "5pF" 0402_Z#1 21.864,52.239 r270 top value=100pF
C114 "NC" 0402_Z#1 20.592,52.239 r270 top value=100pF
C115 "NC" 0402_Z#1 23.136,52.239 r270 top value=100pF
C116 "100 pF" 0402_Z#1 18.282,37.501 r90 top value=100pF
C117 "100pF" 0402_Z#1 60.713,52.528 r0 top
C118 "100 pF" 0402_Z#1 23.227,43.011 r180 top value=100pF
C119 "100 pF" 0402_Z#1 17.257,37.519 r270 top value=100pF
C120 "NC" 0402_Z#1 16.332,38.676 r180 top
C121 "NC" 0402_Z#1 16.332,39.826 r180 top
C122 "100 pF" 0402_Z#1 21.182,41.826 r180 top value=100pF
C123 "100pF" 0402_Z#1 64.148,50.199 r180 top
C124 "100pF" 0402_Z#1 62.159,50.106 r90 top
C125 "100pF" 0402_Z#1 63.606,51.595 r90 top
C126 "100pF" 0402_Z#1 66.126,51.589 r90 top
C127 "100pF" 0402_Z#1 64.859,52.046 r0 top
C128 "100pF" 0402_Z#1 63.006,53.571 r180 top
C129 "100 pF" 0402_Z#1 66.691,24.275 r180 top value=100pF
C130 "100 pF" 0402_Z#1 66.673,23.261 r0 top value=100pF
C131 "100pF" 0402_Z#1 65.434,58.148 r90 top
C132 "100 pF" 0402_Z#1 66.673,22.218 r0 top value=100pF
C133 "100 pF" 0402_Z#1 66.673,21.175 r0 top value=100pF
C134 "100nF" 0402_Z#1 51.072,10.515 r0 top value=100pF
C135 "100 pF" 0402_Z#1 66.691,20.119 r180 top value=100pF
C136 "100 pF" 0402_Z#1 67.278,27.228 r90 top value=100pF
C137 "100 pF" 0402_Z#1 66.56,13.046 r90 top value=100pF
C138 "100 pF" 0402_Z#1 66.691,19.076 r180 top value=100pF
C139 "100 pF" 0402_Z#1 66.691,18.032 r180 top value=100pF
C140 "100 pF" 0402_Z#1 52.831,14.997 r180 top value=100pF
C141 "100nF" 0402_Z#1 66.392,30.079 r270 top value=100pF
C142 "100nF" 0402_Z#1 65.694,16.073 r270 top value=100pF
C143 "100nF" 0402_Z#1 65.481,27.228 r90 top value=100pF
C144 "100nF" 0402_Z#1 64.819,13.046 r90 top value=100pF
C145 "1nF" 0402_Z#1 65.493,30.079 r270 top value=100pF
C146 "1nF" 0402_Z#1 64.827,16.073 r270 top value=100pF
C147 "100 pF" 0402_Z#1 64.582,27.228 r90 top value=100pF
C148 "100 pF" 0402_Z#1 63.948,13.046 r90 top value=100pF
C149 "100 pF" 0402_Z#1 64.594,30.079 r270 top value=100pF
C150 "100 pF" 0402_Z#1 63.961,16.073 r270 top value=100pF
C151 "100 pF" 0402_Z#1 53.846,18.471 r180 top value=100pF
C152 "100 pF" 0402_Z#1 63.642,25.032 r270 top value=100pF
C153 "100 pF" 0402_Z#1 62.099,30.854 r270 top value=100pF
C154 "100 pF" 0402_Z#1 62.099,26.474 r270 top value=100pF
C155 "100 pF" 0402_Z#1 62.099,24.792 r270 top value=100pF
C156 "100 pF" 0402_Z#1 62.143,17.637 r270 top value=100pF
C157 "100 pF" 0402_Z#1 62.126,11.452 r270 top value=100pF
C158 "100 pF" 0402_Z#1 57.694,11.436 r90 top value=100pF
C159 "100 pF" 0402_Z#1 57.694,15.006 r90 top value=100pF
C160 "100 pF" 0402_Z#1 58.342,30.857 r90 top value=100pF
C161 "100 pF" 0402_Z#1 41.209,39.465 r180 top value=100pF
C162 "100 pF" 0402_Z#1 41.201,38.546 r0 top value=100pF
C163 "100 pF" 0402_Z#1 41.201,37.644 r0 top value=100pF
C164 "100 pF" 0402_Z#1 41.201,36.743 r0 top value=100pF
C165 "100 pF" 0402_Z#1 41.219,35.829 r180 top value=100pF
C166 "100 pF" 0402_Z#1 41.219,34.927 r180 top value=100pF
C167 "100 pF" 0402_Z#1 41.216,34.035 r180 top value=100pF
C168 "100 pF" 0402_Z#1 48.136,23.427 r270 top value=100pF
C169 "100nF" 0402_Z#1 49.038,20.437 r90 top value=100pF
C170 "100nF" 0402_Z#1 49.948,23.427 r270 top value=100pF
C171 "1nF" 0402_Z#1 49.944,20.437 r90 top value=100pF
C172 "100pF" 0402_Z#1 52.46,42.616 r270 top
C173 "100pF" 0402_Z#1 56.922,34.161 r0 top
C174 "100 pF" 0402_Z#1 50.854,23.427 r270 top value=100pF
C175 "100 pF" 0402_Z#1 39.382,39.876 r180 top value=100pF
C176 "100pF" 0402_Z#1 58.642,43.42 r180 top
C177 "100 pF" 0402_Z#1 50.85,20.437 r90 top value=100pF
C178 "100 pF" 0402_Z#1 36.697,40.384 r270 top value=100pF
C179 "100 pF" 0402_Z#1 36.341,29.995 r180 top value=100pF
C180 "100 pF" 0402_Z#1 28.052,32.684 r180 top value=100pF
C181 "100pF" 0402_Z#1 56.272,32.682 r180 top
C182 "100 pF" 0402_Z#1 53.364,19.727 r90 top value=100pF
C183 "100 pF" 0402_Z#1 53.356,24.109 r90 top value=100pF
C184 "100pF" 0402_Z#2 52.197,39.074 r90 top
C185 "100pF" 0402_Z#1 56.795,31.224 r0 top
C186 "100nF" 0402_Z#1 9.568,52.123 r180 top value=100pF
C187 "22uF" 0805_Z 13.889,48.906 r270 top value=100pF
C188 "10uF" 0805_Z 15.521,48.906 r270 top value=100pF
C189 "4.7uF" 0805_Z 9.947,58.546 r180 top value=100pF
C190 "10uF" 0805_Z 9.947,56.927 r180 top value=100pF
C191 "1uF" 0603_Z#1 60.215,5.492 r90 top value=100pF
C192 "1uF" 0603_Z#1 65.883,5.492 r90 top value=100pF
C193 "100nF" 0402_Z#1 10.175,8.075 r180 top value=100pF
C194 "22uF" 0805_Z 14.125,2.9 r180 top value=100pF
C195 "10uF" 0805_Z 10.35,2.925 r0 top value=100pF
C196 "1uF" 0603_Z#1 30.474,39.452 r180 top value=100pF
C197 "1uF" 0603_Z#1 33.082,41.642 r90 top value=100pF
C198 "4.7uF" 0805_Z 10.588,12.786 r180 top value=100pF
C199 "10uF" 0805_Z 7.685,9.312 r90 top value=100pF
C200 "1uF" 0603_Z#1 9.574,25.375 r0 top value=100pF
C201 "1uF" 0603_Z#1 11.817,20.424 r90 top value=100pF
C202 "1uF" 0603_Z#1 20.789,4.564 r90 top value=100pF
C203 "1uF" 0603_Z#1 23.453,6.564 r0 top value=100pF
C204 "1uF" 0603_Z#1 58.26,5.472 r270 top value=100pF
C205 "1uF" 0603_Z#1 52.678,5.472 r270 top value=100pF
C206 "1uF" 0603_Z#1 23.732,36.201 r90 top value=100pF
C207 "1uF" 0603_Z#1 29.101,36.149 r90 top value=100pF
C208 "1uF" 0603_Z#1 15.086,57.878 r90 top value=100pF
C209 "1uF" 0603_Z#1 20.795,57.884 r90 top value=100pF
C210 "1uF" 0603_Z#1 54.718,57.91 r90 top value=100pF
C211 "1uF" 0603_Z#1 60.298,57.91 r90 top value=100pF
C212 "1uF" 0603_Z#1 9.624,27.932 r0 top value=100pF
C213 "1uF" 0603_Z#1 12.106,32.472 r0 top value=100pF
C214 "1uF" 0603_Z#1 26.325,43.975 r180 top value=100pF
C215 "1uF" 0603_Z#1 26.7,38.275 r0 top value=100pF
C216 "20pF  NP0" 0402_Z#1 41.278,19.271 r90 top
C217 "20pF  NP0" 0402_Z#1 37.185,18.565 r90 top
C218 "10 nF" 0402_Z#1 42.189,19.289 r270 top value=100pF
C219 "100 nF" 0402_Z#1 43.089,19.289 r270 top value=100pF
C220 "4.7 uF" 0603_Z#1 44.475,26.375 r0 top value=100pF
C221 "100 nF" 0402_Z#1 44.3,25 r0 top value=100pF
D1 "LED0" 0603_Z#1 2.307,11.301 r0 top
F1 "JFC1206-1300FS" F1206 7.525,13.325 r270 top
L1 "BEAD" 0603_Z#1 23.418,7.988 r0 top value=10mH
L2 "MMZ1608B601C" 0402_Z#1 14.82,6.976 r180 top value=?nH
L3 "MMZ1608B601C" 0402_Z#1 14.82,7.892 r180 top value=?nH
L4 "" 0603_Z#1 34.01,23.427 r180 top value=33nH
L5 "BEAD" 0603_Z#1 31.764,19.209 r270 top value=10mH
L6 "1nH" 0402_Z#1 27.697,27.447 r270 top
L7 "270uH" 1210_Z 44.835,3.964 r0 top value=470uH
L8 "390uH" 1210_Z 48.626,4.914 r270 top value=470uH
L9 "NC" 1210_Z 41.152,4.914 r90 top value=470uH
L10 "BEAD" 0603_Z#1 29.573,18.501 r0 top value=10mH
L11 "1nH" 0402_Z#1 28.678,27.447 r270 top
L12 "NC" 1210_Z 41.152,9.679 r90 top value=470uH
L13 "BEAD" 0603_Z#2 30.763,29.272 r0 top value=10mH
L14 "270uH" 1210_Z 44.962,10.629 r0 top value=470uH
L15 "390uH" 1210_Z 48.626,9.679 r90 top value=470uH
L16 "12 nH" 0402_Z#1 29.316,24.344 r270 top value=10mH
L17 "270uH" 1210_Z 28.098,8.663 r270 top value=470uH
L18 "390uH" 1210_Z 29.048,4.853 r180 top value=470uH
L19 "NC" 1210_Z 31.175,8.663 r270 top value=470uH
L20 "NC" 1210_Z 34.251,8.663 r90 top value=470uH
L21 "BEAD" 0603_Z#1 26.106,15.845 r270 top value=10mH
L22 "270uH" 1210_Z 37.328,8.663 r270 top value=470uH
L23 "390uH" 1210_Z 36.396,4.794 r0 top value=470uH
L24 "BEAD" 0603_Z#1 23.486,15.845 r270 top value=10mH
L25 "BEAD" 0603_Z#1 23.452,32.937 r90 top value=10mH
L26 "1.8nH" 0402_Z#1 19.318,31.06 r90 top value=10mH
L27 "1.8nH" 0402_Z#1 18.466,31.06 r90 top value=10mH
L28 "8.2nH" 0402_Z#1 20.177,29.579 r270 top
L29 "8.2nH" 0402_Z#1 17.682,29.557 r270 top
L30 "BEAD" 0603_Z#1 15.3,32.5 r180 top value=10mH
L31 "BEAD" 0603_Z#1 15.225,17.35 r180 top value=10mH
L32 "BEAD" 0603_Z#1 13.369,26.233 r180 top value=10mH
L33 "BEAD" 0603_Z#1 14.668,19.209 r270 top value=10mH
L34 "BEAD" 0603_Z#1 24.795,15.865 r90 top value=10mH
L35 "BEAD" 0603_Z#1 13.369,24.685 r180 top value=10mH
L36 "18nH" 0402_Z#1 17.032,41.501 r0 top value=10mH
L37 "47nH" 0402_Z#1 17.007,45.051 r0 top value=10mH
L38 "4.9nH" 0603_Z#1 41.767,52.665 r180 top value=10mH
L39 "2.7nH" 0603_Z#1 47.888,52.665 r180 top value=10mH
L40 "18nH" 0402_Z#1 63.352,30.486 r180 top value=10mH
L41 "18nH" 0402_Z#1 62.572,16.371 r180 top value=10mH
L42 "47nH" 0402_Z#1 63.27,26.811 r180 top value=10mH
L43 "47nH" 0402_Z#1 62.572,12.697 r180 top value=10mH
L44 "18nH" 0402_Z#1 52.108,20.096 r0 top value=10mH
L45 "47nH" 0402_Z#1 52.098,23.77 r0 top value=10mH
L46 "4.7 uH" "INDC 4040X25N" 10.46,49.289 r180 top value=10mH
L47 "4.7 uH" "INDC 4040X25N" 11.275,5.575 r180 top value=10mH
L48 "BEAD" 0603_Z#1 44.288,18.803 r270 top value=10mH
LDMOS1 "LDMOS" LDMOS 33.062,52.638 r0 top
P1 "Header20" Header20 2.413,23.882 r180 top
P2 "SF9078" SF8009 35.881,27.173 r180 top
P3 "SF9078" SF8009 18.278,48.123 r0 top
P4 "SF9078" SF8009 62.085,33.782 r0 top
P5 "SF9078" SF8009 31.162,32.683 r90 top
R1 "33R" 0402_Z#1 44.861,21.674 r0 top value=100R
R2 "33R" 0402_Z#1 44.879,20.719 r180 top value=100R
R3 "4.7K" 0402_Z#1 27.704,22.237 r90 top
R4 "2.7K" 0402_Z#1 28.123,20.894 r180 top
R5 "33R" 0402_Z#1 21.159,15.658 r270 top
R6 "33R" 0402_Z#1 20.656,17.267 r270 top
R7 "33R" 0402_Z#1 20.157,15.658 r270 top
R8 "33R" 0402_Z#1 19.653,17.267 r270 top
R9 "33R" 0402_Z#1 19.156,15.658 r270 top
R10 "33R" 0402_Z#1 18.65,17.267 r270 top
R11 "33R" 0402_Z#1 18.154,15.658 r270 top
R12 "47k" 0402_Z#1 15.188,21.876 r270 top value=1K
R13 "47k" 0402_Z#1 16.087,21.876 r270 top value=1K
R14 "10K" 0402_Z#1 28.32,14.651 r270 top value=100R
R15 "50" 0402_Z#1 29.232,14.651 r270 top value=100R
R16 "0" 0402_Z#1 36.521,16.693 r90 top
R17 "0" 0402_Z#1 35.692,16.693 r90 top
R18 "100" 0402_Z#1 34.863,15.125 r90 top value=2k
R19 "100" 0402_Z#1 34.875,16.711 r270 top value=2k
R20 "100" 0402_Z#1 27.445,16.301 r270 top value=2k
R21 "2k" 0402_Z#1 35.704,15.143 r270 top
R22 "1k" 0402_Z#1 36.534,15.143 r270 top
R23 "2k" 0402_Z#1 20.145,37.519 r270 top
R24 "1k" 0402_Z#1 21.007,37.519 r270 top
R25 "6.5k" 0402_Z#1 13.957,44.697 r270 top value=1K
R26 "50" 0402_Z#1 13.043,41.828 r90 top value=1K
R27 "0" 0805 51.335,58.498 r180 top value=1K
R28 "11R" 0603_Z#1 28.37,57.77 r270 top value=1K
R29 "17R" 0402_Z#1 18.257,35.901 r270 top value=1K
R30 "292R" 0402_Z#1 16.782,35.426 r180 top value=1K
R31 "292R" 0402_Z#1 16.775,36.3 r180 top value=1K
R32 "2k" 0402_Z#1 62.988,54.387 r0 top
R33 "2k" 0402_Z#2 51.281,39.084 r270 top
R34 "1k" 0402_Z#1 62.988,55.293 r0 top
R35 "1k" 0402_Z#2 50.392,39.084 r270 top
R36 "50R" 0402_Z#1 56.785,11.436 r90 top value=1K
R37 "0R" 0402_Z#1 51.09,9.599 r180 top value=1K
R38 "6.5k" 0402_Z#1 66.379,27.228 r90 top value=1K
R39 "6.5k" 0402_Z#1 65.69,13.046 r90 top value=1K
R40 "50" 0402_Z#1 67.29,30.079 r270 top value=1K
R41 "50" 0402_Z#1 66.56,16.073 r270 top value=1K
R42 "50" 0402_Z#1 56.785,15.006 r90 top value=1K
R43 "50" 0402_Z#1 63.609,17.975 r180 top value=1K
R44 "6.5k" 0402_Z#1 49.042,23.427 r270 top value=1K
R45 "50" 0402_Z#1 48.133,20.437 r90 top value=1K
R46 "0" 0402_Z#1 47.625,33.925 r270 top value=1K
R47 "50" 0402_Z#1 38.2,33.75 r180 top value=1K
R48 "0" 0402_Z#1 46.8,31.375 r90 top value=1K
R49 "0" 0402_Z#1 47.225,32.65 r180 top value=1K
R50 "110k" 0603_Z#1 12.707,53.451 r90 top value=1K
R51 "22k" 0603_Z#1 12.707,56.176 r90 top value=1K
R52 "10k" 0402_Z#1 25.331,7.37 r270 top
R53 "168k" 0603_Z#1 13.282,10.451 r90 top value=1K
R54 "22k" 0603_Z#1 13.321,13.683 r90 top value=1K
R55 "33R" 0402_Z#1 44.879,22.491 r180 top value=100R
R56 "4.7K" 0402_Z#1 41.645,17.887 r180 top value=1K
R57 "10K" 0402_Z#1 38.074,21.325 r270 top value=1K
RF1 "BWIPX-1-001E" IPEX-SMD_BWIPX-1-001E 2.632,8.901 r90 top
RF2 "BWIPX-1-001E" IPEX-SMD_BWIPX-1-001E 2.842,36.926 r270 top
RF3 "BWIPX-1-001E" IPEX-SMD_BWIPX-1-001E 2.832,41.626 r90 top
RF4 "SMA" "SMAmini - duplicate" 68.398,52.046 r180 top
RF5 "BWIPX-1-001E" IPEX-SMD_BWIPX-1-001E 50.5,35.825 r90 top
RF6 "BWIPX-1-001E" IPEX-SMD_BWIPX-1-001E 50.5,29.475 r270 top
RX1 "2.3k" 0402_Z#1 18.732,59.526 r180 top value=1K
RX2 "1k" 0402_Z#1 17.182,59.538 r0 top value=1K
U1 "FM15F366" "QFN40 5X5X04P" 16.542,12.806 r270 top
U2 "SLBL18-1R500G  -05-31T" Balun-0900BL15C050 27.464,30.889 r270 top
U3 "SLBL18-1R500G  -05-31T" Balun-0900BL15C050 31.764,25.034 r180 top
U4 "FM13RD1616" FM13RD1616E 21.907,23.365 r270 top
U5 "SLBL18-1R500G  -05-31T" Balun-0900BL15C050 18.159,34.77 r270 top
U6 "48MHz温补晶振" 48MH温补晶振 27.057,12.826 r0 top
U7 "ADG918" ADG918 31.682,14.601 r180 top
u8 "FW1103" FW1103W 18.542,43.231 r0 top
U9 "DC0900P10" DC0900P10 56.392,50.406 r90 top
U10 "MXD8625C" MXD8625C 18.123,38.349 r90 top
U11 "MXD8625C" MXD8625C 18.464,40.253 r270 top
U12 "AiP74LVC1G14GC.TR" "SOT-353 L2.1-W1.3-P0.65" 23.103,41.081 r270 top
U13 "MXD8625C" BGA-6_L1.1-W0.7-R3-C2-P0.40-BR 62.365,52.046 r180 top
U14 "AiP74LVC1G14GC.TR" SOT-353_L2.1-W1.3-P0.65 63.379,57.977 r90 top
U15 "MS2351" MS2351 52.831,12.795 r180 top
U16 "HGC2005LP4" HGC2005LP4 62.891,21.283 r270 top
U17 "PD0900U03-070" PD0900U03-070 57.695,17.576 r90 top
u18 "FW1103" FW1103W 61.834,28.648 r180 top
u19 "FW1103" FW1103W 61.892,14.53 r180 top
U20 "DC09T10" DC09T10 56.921,13.266 r180 top
U21 "HGC2005LP4" HGC2005LP4 37.47,36.728 r270 top
U22 "" BGA-6_L1.1-W0.7-R3-C2-P0.40-BR 53.129,40.827 r0 top
U23 "" BGA-6_L1.1-W0.7-R3-C2-P0.40-BR 57.949,32.701 r0 top
u24 "FW1103" FW1103W 53.617,21.908 r0 top
U25 "SY8121BABC" SOT-23-6_L2.9-W1.6-P0.95-LS2.8-TL 9.952,54.33 r180 top
U26 "SGM2036-5V" SOT-23-5 62.961,5.267 r0 top
U27 "SGM2036-5V" SOT-23-5 30.699,42.29 r90 top
U28 "SY8121BABC" SOT-23-6_L2.9-W1.6-P0.95-LS2.8-TL 10.624,10.275 r180 top
U29 "SGM2036-3.3V" SOT-23-5 9.348,22.619 r270 top
U30 "SGM2036-3.3V" SOT-23-5 23.638,4.339 r0 top
U31 "SGM2036-5V" SOT-23-5 55.434,5.697 r180 top
U32 "SGM2036-3.3V" SOT-23-5 26.322,35.984 r0 top
U33 "SGM2036-ADJ" SOT-23-5 17.657,57.651 r0 top
U34 "SGM2036-2.8V" SOT-23-5 57.552,57.684 r0 top
U35 "SGM2036-1.8V" SOT-23-5 11.51,30.332 r0 top
U36 "SGM2036-2.8V" SOT-23-5 26.5,41.15 r270 top
U37 "GD32E232K8Q7TR" QFN-32_L4.0-W4.0-P0.40-TL-EP2.8 41.307,22.894 r90 top
Y1 "12MHz无源晶振" XTAL_2520 17.854,5.26 r90 top
Y2 "48MHz无源晶振" XTAL_2520 39.119,18.7 r180 top

## Footprints (in the part's own frame and the unit in brackets; to place one, negate y for a bottom-side part, rotate by r counter-clockwise, add the part's x,y. Pads: shape width x height; smd on the part's side, far side on the other; paste and mask are expansions set on the pad)
48MH温补晶振 [mil] "YSO510TP 48MHZ 3.3V ±1.5PPM -30~85℃ (±0.5PPM) Clipped Sine Wave"
  rect 17.3x31.5 smd: 1(-38.4,-28.6) 2(38.4,-28.6) 3(38.4,18.7) 4(-38.4,18.7)
  silkscreen extent -64,-65 59,30
0402_Z#1 [mm]
  rect 0.45x0.6 smd mask+0: 1(0.434,-0.006) 2(-0.416,-0.006)
  silkscreen extent -0.64,-0.31 0.66,0.29
0402_Z#2 [mm]
  rect 0.45x0.6 smd mask+0: 1(0.434,0.006) 2(-0.416,0.006)
  silkscreen extent -0.64,-0.29 0.66,0.31
0603_Z#1 [mm]
  rect 0.7x1 smd mask+0: 1(0.735,0.013) 2(-0.765,0.013)
  silkscreen extent -1.12,-0.49 1.09,0.52
0603_Z#2 [mm]
  rect 0.7x1 smd mask+0: 1(0.735,-0.013) 2(-0.765,-0.013)
  silkscreen extent -1.12,-0.52 1.09,0.49
0805 [mm]
  rect 0.8x1.4 smd: 1(-1.1,0) 2(1.1,0)
  silkscreen extent -1.63,-0.83 1.64,0.83
0805_Z [mm]
  rect 0.7x1.1 smd: 1(0.95,0) 2(-0.95,0)
  silkscreen extent -1.31,-0.56 1.31,0.56, body extent -0.8,-0.41 0.8,0.41, height 0.46
1210_Z [mm]
  rect 0.9x2.3 smd: 1(-1.65,0) 2(1.65,0)
  silkscreen extent -2.11,-1.16 2.11,1.16, body extent -1.78,-1.13 1.67,1.13, height 1.3
ADG918 [mm]
  rect 0.4x1.15 smd: 1(-0.975,-2.15) 2(-0.325,-2.15) 3(0.325,-2.15) 4(0.975,-2.15) 5(0.975,2.15) 6(0.325,2.15) 7(-0.325,2.15) 8(-0.975,2.15)
  rect 1.93x1.57 smd mask+0.102: 9(0,0)
  silkscreen extent -1.77,-2.32 1.5,1.3
Balun-0900BL15C050 [mm]
  rect 0.35x0.8 smd mask+0.051: 1(0,0.15) 2(0.65,0.15) 3(1.3,0.15) 4(1.3,1.25) 6(0,1.25)
  rect 0.36x0.8 smd mask+0.051: 5(0.65,1.25)
  silkscreen extent -0.35,0.05 1.65,1.3, body extent -0.34,0.06 1.66,1.31, height 0.8
BGA-6_L1.1-W0.7-R3-C2-P0.40-BR [mm]
  round 0.2 smd paste-100 mask+0.05: 1(0.203,-0.4) 2(0.203,0) 3(0.203,0.4) 4(-0.197,0.4) 5(-0.197,0) 6(-0.197,-0.4)
  silkscreen extent -0.42,-0.63 0.69,0.63
DC09T10 [mm]
  rrect50% 0.3x0.3 smd: 1(-0.65,0.475) 2(0,0.475) 3(0.65,0.475) 4(0.65,-0.475) 5(0,-0.475) 6(-0.65,-0.475)
  silkscreen extent -1,-0.63 1,0.63
DC0900P10 [mm]
  rect 0.84x1.034 smd mask+0: 1(2.123,2.674) 3(-2.137,-2.662) 4(-2.137,2.674)
  rect 0.84x1.032 smd mask+0: 2(2.123,-2.663)
  rect 2.4x1.8 smd mask+0: 5(-0.007,-2.279) 5(-0.007,2.291)
  rect 5.1x3.31 smd mask+0: 5(-0.007,0.018)
F1206 [mm]
  rect 1.19x1.728 smd paste+0 mask+0.051: 1(-1.445,0) 2(1.445,0)
  silkscreen extent -2.27,-1.09 2.27,1.09
FM13RD1616E [mm]
  oval 0.9x0.25 smd: 1(-4.45,3.75) 2(-4.45,3.25) 3(-4.45,2.75) 4(-4.45,2.25) 5(-4.45,1.75) 6(-4.45,1.25) 7(-4.45,0.75) 8(-4.45,0.25) 9(-4.45,-0.25) 10(-4.45,-0.75) 11(-4.45,-1.25) 12(-4.45,-1.75) 13(-4.45,-2.25) 14(-4.45,-2.75) 15(-4.45,-3.25) 16(-4.45,-3.75) 33(4.45,-3.75) 34(4.45,-3.25) 35(4.45,-2.75) 36(4.45,-2.25) 37(4.45,-1.75) 38(4.45,-1.25) 39(4.45,-0.75) 40(4.45,-0.25) 41(4.45,0.25) 42(4.45,0.75) 43(4.45,1.25) 44(4.45,1.75) 45(4.45,2.25) 46(4.45,2.75) 47(4.45,3.25) 48(4.45,3.75)
  oval 0.25x0.9 smd: 17(-3.75,-4.45) 18(-3.25,-4.45) 19(-2.75,-4.45) 20(-2.25,-4.45) 21(-1.75,-4.45) 22(-1.25,-4.45) 23(-0.75,-4.45) 24(-0.25,-4.45) 25(0.25,-4.45) 26(0.75,-4.45) 27(1.25,-4.45) 28(1.75,-4.45) 29(2.25,-4.45) 30(2.75,-4.45) 31(3.25,-4.45) 32(3.75,-4.45) 49(3.75,4.45) 50(3.25,4.45) 51(2.75,4.45) 52(2.25,4.45) 53(1.75,4.45) 54(1.25,4.45) 55(0.75,4.45) 56(0.25,4.45) 57(-0.25,4.45) 58(-0.75,4.45) 59(-1.25,4.45) 60(-1.75,4.45) 61(-2.25,4.45) 62(-2.75,4.45) 63(-3.25,4.45) 64(-3.75,4.45)
  rect 7.1x7.1 smd: 65(0,0)
  silkscreen extent -5.47,-4.7 4.7,4.7, body extent -4.55,-4.55 4.55,4.55, height 0.8
FW1103W [mm]
  rect 1.6x0.9 smd mask+0: 0(0,0)
  rect 0.3x0.3 smd mask+0: 1(-0.75,-0.85) 2(-0.25,-0.85) 3(0.25,-0.85) 4(0.75,-0.85) 5(0.75,0.85) 6(0.25,0.85) 7(-0.25,0.85) 8(-0.75,0.85)
  round 0.1 on Top Overlay mask+0: ""(-1.036,-1.113)
  Top Layer region: 0.615,-0.45 0.898,-0.45 0.898,0.452 0.615,0.452
  Top Layer region: 0.6,-0.849 0.9,-0.849 0.9,0.851 0.6,0.851
  Top Layer region: 0.1,-0.849 0.4,-0.849 0.4,0.851 0.1,0.851
  Top Layer region: -0.902,-0.45 -0.602,-0.45 -0.602,0.85 -0.902,0.85
  Top Layer region: -0.901,-0.449 -0.618,-0.449 -0.618,0.451 -0.901,0.451
  silkscreen extent -0.96,-1.03 0.94,1.03
Header20 [mm]
  rect 1.4x0.4 smd: 1(-2.692,9.73) 2(-2.692,8.73) 3(-2.692,7.73) 4(-2.692,6.73) 5(-2.692,5.73) 6(-2.692,4.73) 7(-2.692,3.73) 8(-2.692,2.73) 9(-2.692,1.73) 10(-2.692,0.73) 11(-2.692,-0.27) 12(-2.692,-1.27) 13(-2.692,-2.27) 14(-2.692,-3.27) 15(-2.692,-4.27) 16(-2.692,-5.27) 17(-2.692,-6.27) 18(-2.692,-7.27) 19(-2.692,-8.27) 20(-2.692,-9.27)
  rect 2.2x1.2 smd: 21(0.37,10.913) 21(0.37,-10.47)
  silkscreen extent -1.74,-9.48 1.81,9.95
HGC2005LP4 [mm] "数控衰减器"
  oval 0.8x0.28 smd mask+0: 1(-2,1.262) 2(-2,0.763) 3(-2,0.262) 4(-2,-0.237) 5(-2,-0.738) 6(-2,-1.237) 13(2,-1.237) 14(2,-0.738) 15(2,-0.237) 16(2,0.262) 17(2,0.763) 18(2,1.255)
  oval 0.28x0.8 smd mask+0: 7(-1.25,-1.988) 8(-0.75,-1.988) 9(-0.25,-1.988) 10(0.25,-1.988) 11(0.75,-1.988) 12(1.25,-1.988) 19(1.25,2.012) 20(0.75,2.012) 21(0.25,2.012) 22(-0.25,2.012) 23(-0.75,2.012) 24(-1.25,2.012)
  rect 2.8x2.8 smd mask+0: 25(-0.007,0.022)
  rect 2.7x2.7 smd mask+0: 25(0,0)
  Top Layer region: -1.408,-1.237 1.393,-1.237 1.393,-1.987 -1.407,-1.987
  Top Layer lines w0.28: 2,-1.237 1.393,-1.237 ; -1.408,-1.237 -2,-1.237 ; 2,-0.237 1.346,-0.237 ; -1.345,-0.237 -2,-0.237
  silkscreen extent -2.15,-2.15 2.15,2.15
"INDC 4040X25N" [mm]
  rect 1.5x3.6 smd: 1(-1.5,0) 2(1.5,0)
  silkscreen extent -2.1,-2.08 2.1,2.07, body extent -1.95,-1.96 1.95,1.96, height 2.1
IPEX-SMD_BWIPX-1-001E [mm] "IPEX-SMD_BWIPX-1-001E"
  rect 1.05x1 smd: 1(-1.497,-0.005)
  rect 2.2x1.05 smd: 2(0.028,-1.48) 3(0.028,1.47)
  silkscreen extent -1.37,-1.28 1.43,1.26
LDMOS [mm]
  rect 4.25x7 smd mask+0: 1(4.994,0.007)
  rect 4x7 smd mask+0: 2(-5.328,0.007)
  rect 4x11 smd mask+0: 3(-0.228,0.007)
  silkscreen extent -4.33,-5.53 3.85,5.55
MS2351 [mm] "功率检测"
  rect 0.82x0.4 smd mask+0.051: 1(-2.11,0.97) 2(-2.11,0.321) 3(-2.11,-0.33) 4(-2.11,-0.98) 5(2.19,-0.98) 6(2.19,-0.33) 7(2.19,0.321) 8(2.19,0.97)
  silkscreen extent -2.13,-1.5 1.34,1.77
MXD8625C [mil]
  round 8 smd mask+3: 1(20.75,-21.93) 2(20.75,-6.18) 3(20.75,9.57) 4(5,9.57) 5(5,-6.18) 6(5,-21.93)
  silkscreen extent -4,-32 33,18
PD0900U03-070 [mm]
  rect 0.7x0.4 smd mask+0: 1(-1,0.65) 2(-1,0) 3(-1,-0.65) 4(1,-0.65) 5(1,0) 6(1,0.65)
  rect 0.8x1.3 smd mask+0: 7(0,0)
  Top Layer region: -0.399,-0.202 -0.399,0.2 1.067,0.2 1.067,-0.201
  Top Layer region: 0.399,-0.448 0.399,-0.85 -1.067,-0.85 -1.067,-0.449
  Top Layer region: 0.399,0.852 0.399,0.45 -1.067,0.45 -1.067,0.851
  silkscreen extent -1.35,-1.04 1.02,1.11
"QFN40 5X5X04P" [mm] "FM15F336"
  oval 0.2x0.6 smd: 1(0,0) 2(0.4,0) 3(0.8,0) 4(1.2,0) 5(1.6,0) 6(2,0) 7(2.4,0) 8(2.8,0) 9(3.2,0) 10(3.6,0) 21(3.6,5) 22(3.2,5) 23(2.8,5) 24(2.4,5) 25(2,5) 26(1.6,5) 27(1.2,5) 28(0.8,5) 29(0.4,5) 30(0,5)
  oval 0.6x0.2 smd: 11(4.3,0.7) 12(4.3,1.1) 13(4.3,1.5) 14(4.3,1.9) 15(4.3,2.3) 16(4.3,2.7) 17(4.3,3.1) 18(4.3,3.5) 19(4.3,3.9) 20(4.3,4.3) 31(-0.7,4.3) 32(-0.7,3.9) 33(-0.7,3.5) 34(-0.7,3.1) 35(-0.7,2.7) 36(-0.7,2.3) 37(-0.7,1.9) 38(-0.7,1.5) 39(-0.7,1.1) 40(-0.7,0.7)
  rect 3.2x3.2 smd: 41(1.8,2.5)
  silkscreen extent -1.15,-0.62 4.3,5, body extent -0.69,0 4.29,4.98, height 1
QFN-32_L4.0-W4.0-P0.40-TL-EP2.8 [mm]
  oval 0.7x0.2 smd paste-100 mask+0.051: 1(-2.057,1.4) 2(-2.057,1) 3(-2.057,0.6) 4(-2.057,0.2) 5(-2.057,-0.2) 6(-2.057,-0.6) 7(-2.057,-1) 8(-2.057,-1.4) 17(2.057,-1.4) 18(2.057,-1) 19(2.057,-0.6) 20(2.057,-0.2) 21(2.057,0.2) 22(2.057,0.6) 23(2.057,1) 24(2.057,1.4)
  oval 0.2x0.7 smd paste-100 mask+0.051: 9(-1.4,-2.057) 10(-1,-2.057) 11(-0.6,-2.057) 12(-0.2,-2.057) 13(0.2,-2.057) 14(0.6,-2.057) 15(1,-2.057) 16(1.4,-2.057) 25(1.4,2.057) 26(1,2.057) 27(0.6,2.057) 28(0.2,2.057) 29(-0.2,2.057) 30(-0.6,2.057) 31(-1,2.057) 32(-1.4,2.057)
  rect 2.8x2.8 smd paste-100 mask+0.051: 33(0,0)
  silkscreen extent -2.31,-2 2,2
SF8009 [mm]
  rect 0.6x1.5 smd: 1(-1.1,0.75)
  rect 0.6x0.85 smd: 2(0,1.075) 3(1.1,1.075) 4(1.1,-1.075) 5(0,-1.075) 6(-1.1,-1.075)
  silkscreen extent -1.5,-1.57 1.5,1.58
"SMAmini - duplicate" [mm] "R2000 Module"
  rect 3x1 smd: 1(0,0)
  rect 3x1.2 smd: 2(0,1.9) 3(0,-1.9)
  silkscreen extent -2.7,-2.3 -1.7,2.3
SOT-23-5 [mm]
  rect 0.7x0.5 smd: 1(-1.4,0.95) 2(-1.4,0) 3(-1.4,-0.95) 4(1.4,-0.95) 5(1.4,0.95)
  silkscreen extent -0.81,-1.3 0.79,1.3
SOT-23-6_L2.9-W1.6-P0.95-LS2.8-TL [mm]
  rect 1.072x0.532 smd paste+0 mask+0.051: 1(-1.149,0.95) 2(-1.149,0) 3(-1.149,-0.95) 4(1.149,-0.95) 5(1.149,0) 6(1.149,0.95)
  silkscreen extent -1.45,-1.54 0.89,1.82
"SOT-353 L2.1-W1.3-P0.65" [mm]
  rect 0.839x0.315 smd: 1(0.82,-0.635) 2(0.82,0.015) 3(0.82,0.665) 4(-0.869,0.665) 5(-0.869,-0.635)
  silkscreen extent -0.73,-1.39 1.12,1.12
SOT-353_L2.1-W1.3-P0.65 [mm]
  rect 0.315x0.839 smd: 1(0.65,0.961) 2(0,0.961) 3(-0.65,0.961) 4(-0.65,-0.727) 5(0.65,-0.727)
  silkscreen extent -1.1,-0.58 1.41,1.26
XTAL_2520 [mm]
  rrect50% 0.75x0.85 smd: 1(0.975,0.675)
  rect 0.75x0.85 smd: 2(-0.975,0.675) 3(-0.975,-0.675) 4(0.975,-0.675)
  silkscreen extent -0.41,-1.14 0.39,1.14, body extent -1.25,-1 1.25,1, height 0.8

## Part data
C1 C2 C3 C4 C5 C6 C7 C216 C217: library part CAP, "0402"
C8 C9: library part "Cap Pol1", "Polarized Capacitor (Radial)", LatestRevisionDate=17-Jul-2002, LatestRevisionNote="Re-released for DXP Platform.", PackageReference=RB7.6-15, Published=8-Jun-2000, Publisher="Altium Limited"
C10 C11 C12 C13 C14 C15 C16 C17 C21 C22 C25 C26 C31 C32 C33 C34 C35 C39 C43 C45 C46 C49 C50 C51 C52 C53 C54 C55 C56 C57 C58 C59 C60 C61 C62 C63 C64 C65 C66 C67 C68 C69 C70 C71 C72 C73 C74 C75 C76 C77 C78 C79 C80 C81 C82 C83 C84 C85 C86 C87 C88 C89 C90 C91 C92 C93 C94 C95 C96 C97 C98 C99 C100 C101 C102 C103 C104 C105 C106 C107 C108 C109 C110 C111 C112 C113 C114 C115 C116 C117 C118 C119 C122 C129 C130 C132 C133 C134 C135 C136 C137 C138 C139 C140 C141 C142 C143 C144 C145 C146 C147 C148 C149 C150 C151 C152 C153 C154 C155 C156 C157 C158 C159 C160 C161 C162 C163 C164 C165 C166 C167 C168 C169 C170 C171 C174 C175 C177 C178 C179 C180 C182 C183 C186 C187 C188 C189 C190 C191 C192 C193 C194 C195 C196 C197 C198 C199 C200 C201 C202 C203 C204 C205 C206 C207 C208 C209 C210 C211 C212 C213 C214 C215 C218 C219 C220 C221: library part Cap, "Capacitor", LatestRevisionDate=17-Jul-2002, LatestRevisionNote="Re-released for DXP Platform.", PackageReference=RAD-0.3, Published=8-Jun-2000, Publisher="Altium Limited"
  C21 C22 C31 C32 C33 C34 C35 C39 C43 C49 C50 C51 C52 C55 C56 C57 C58 C59 C60 C61 C62 C63 C64 C65 C66 C67 C68 C69 C70 C71 C72 C73 C74 C75 C76 C77 C78 C79 C80 C81 C82 C83 C84 C85 C86 C87 C88 C89 C90 C91 C92 C93 C94 C95 C96 C97 C98 C99 C100 C101 C102 C103 C104 C105 C106 C107 C108 C109 C110 C111 C112 C113 C114 C115 C116 C117 C118 C119 C122 C129 C130 C132 C133 C134 C135 C136 C137 C138 C139 C140 C141 C142 C143 C144 C145 C146 C147 C148 C149 C150 C151 C152 C153 C154 C155 C156 C157 C158 C159 C160 C161 C162 C163 C164 C165 C166 C167 C168 C169 C170 C171 C174 C175 C177 C178 C179 C180 C182 C183 C186 C187 C188 C189 C190 C191 C192 C193 C194 C195 C196 C197 C198 C199 C200 C201 C202 C203 C204 C205 C206 C207 C208 C209 C210 C211 C212 C213 C214 C215 C218 C219 C220 C221: PackageDescription="Radial Cap, Thru-Hole; 2 Leads; 0.3 in Pin Spacing"
C18 C19 C20 C23 C24 C27 C28 C29 C30 C36 C37 C38 C40 C41 C42 C44 C47 C48 C123 C124 C125 C126 C127 C128 C131 C172 C173 C176 C181 C184 C185: library part Cap
C120 C121: library part Cap_NC
D1: "Typical INFRARED GaAs LED", LatestRevisionDate=08-Jul-2005, LatestRevisionNote="Mech Layer 1 removed.", PackageDescription="LED; 2 Leads", PackageReference=LED-0, Published=8-Jun-2000, Publisher="Altium Limited"
F1: Breaking Capacity @ Rated Voltage=50A, Current Rating=3A, JLCPCB Part Class="Extended Part", LCSC Part Name="3A 63V 快断", Manufacturer=JDTfuse(集电通), Nominal Cold Resistance=53mΩ, Nominal Voltage Drop=187mV, Operating Temperature="-55°C ~ 125°C", Rated Voltage(AC)=-, Rated Voltage(DC)=24V/32V/63V/72V, Add into BOM=yes, Convert to PCB=yes, Datasheet=https://atta.szlcsc.com/upload/public/pdf/source/20171023/C136347_15087480789771053481.pdf, Device=JFC1206-1300FS, Fuse Type=快速熔断, Manufacturer Part=JFC1206-1300FS, Melting I²t=1.39, Name=JFC1206-1300FS, Product=贴片式保险丝, Supplier=LCSC, Supplier Footprint=1206, Supplier Part=C136347, Symbol=JFC1206-1300FS
L1 L5 L10 L13 L16 L21 L24 L25 L26 L27 L30 L31 L32 L33 L34 L35 L36 L37 L38 L39 L40 L41 L42 L43 L44 L45 L46 L47 L48: library part Inductor, "Inductor", Code_IEC=1005, Code_JEITA=0402, LatestRevisionDate=29-May-2009, LatestRevisionNote="IPC-7351 Footprint Added.", PackageDescription="Chip Inductor", PackageReference=0402-A, Published=8-Jun-2000, Publisher="Altium Limited"
L2 L3 L4: library part INDUCTOR1, "INDUCTOR"
L6 L11 L28 L29: library part IND, "Inductor, 80mA, ±10%", 2nd source part number=178-6105, Manufacturer="Taiyo Yuden", Manufacturer Part Number=LBMF1608T100K, Part Number=L0603-10µ, Supplier part number=587-1714-1-ND, 2nd source Supplier=Farnell, Artikkelnr Noca=33029314, Artikkelnr Simpro=N.A., ComponentLink1Description=Datasheet, ComponentLink2Description="Supplier link", Datasheet=http://www.yuden.co.jp/ut/product/pdf/elb2_e.pdf, Footprint Doc=0603, LatestRevisionDate=2012-09-19, Note="LBMF1608T100K 10µH 80mA 0603", Pin Count=2, Published=2010-02-24, Publisher="Nordic Semiconductor", Supplier=Digi-Key
L7 L8 L9 L12 L14 L15 L17 L18 L19 L20 L22 L23: library part 470uH大电感, DC Resistance (DCR)=22.5Ω, Frequency - Self Resonant=2MHz, JLCPCB Part Class="Extended Part", LCSC Part Name="470uH ±10% 22.5Ω", Manufacturer=FH(风华), Manufacturer Part=FHW1210IF471KST, Q @ Freq=8@796kHz, Rated Current=40mA, Ratings=-, Tolerance=±10%, Add into BOM=yes, Convert to PCB=yes, Datasheet=https://atta.szlcsc.com/upload/public/pdf/source/20230314/04CD9A2FDF314BADB654B282B27A36D2.pdf, Device=FHW1210IF471KST, Name=470uH, Saturation Current (Isat)=-, Supplier=LCSC, Supplier Footprint=1210, Supplier Part=C75644, Symbol=FHW1210IF471KST
P2 P3 P4 P5: library part "Header 3X2A", "Header, 3-Pin, Dual row", LatestRevisionDate=17-Jul-2002, LatestRevisionNote="Re-released for DXP Platform.", Publisher="Altium Limited"
R1 R2 R14 R15 R55: library part Res, "0402", Published=8-Jun-2000, Publisher="Altium Limited", Revision="July-2002: Re-released for DXP Platform."
R3 R4 R5 R6 R7 R8 R9 R10 R11 R12 R13 R25 R26 R27 R28 R29 R30 R31 R36 R37 R38 R39 R40 R41 R42 R43 R44 R45 R46 R47 R48 R49 R50 R51 R53 R54 R56 R57 RX1 RX2: library part Res1, "Resistor", Published=8-Jun-2000, Publisher="Altium Limited"
  R3 R4 R5 R6 R7 R8 R9 R10 R11: Revision="July-2002: Re-released for DXP Platform."
  R12 R13 R25 R26 R27 R28 R29 R30 R31 R36 R37 R38 R39 R40 R41 R42 R43 R44 R45 R46 R47 R48 R49 R50 R51 R53 R54 R56 R57 RX1 RX2: LatestRevisionDate=17-Jul-2002, LatestRevisionNote="Re-released for DXP Platform.", PackageDescription="Axial Device, Thru-Hole; 2 Leads; 0.3 in Pin Spacing", PackageReference=AXIAL-0.3
R16 R17: library part Res3_14, "Resistor", LatestRevisionDate=04-Mar-2005, LatestRevisionNote="PCB Footprint replaced.", PackageReference=J1-0603, Published=8-Jun-2000, Publisher="Altium Limited"
R18 R19 R20 R21 R22 R23 R24 R32 R33 R34 R35: library part Resistor, "Thick Film Resistor"
R52: library part Res3, "Resistor", LatestRevisionDate=04-Mar-2005, LatestRevisionNote="PCB Footprint replaced.", PackageReference=J1-0603, Published=8-Jun-2000, Publisher="Altium Limited"
U1: library part FM399_QFN40
U9: library part DC0900A10
U12 U14: library part 反相器, Manufacturer_Name="Wuxi I-CORE Electronics Co.", Manufacturer_Part_Number=AiP74LVC1G14GC, Datasheet Link=https://datasheet.lcsc.com/lcsc/2208161803_Wuxi-I-core-Elec-AiP74LVC1G14GC-TR_C5138995.pdf, Height=1.1mm
U15: "功率检测器", Current - Input Bias（Ib）=-, JLCPCB Part Class="Extended Part", Manufacturer=杭州瑞盟, -3db Bandwidth（G=1）=-, Add into BOM=yes, Amplifier Type=-, Convert to PCB=yes, Datasheet=https://atta.szlcsc.com/upload/public/pdf/source/20201221/C1509084_D980DDA325D6CD8A9ADBC0470C8A29D7.pdf, Device=MS2351, Gain Bandwidth Product（GBP）=-, Iq per channel (Typ)=-, LCSC Part Name=MS2351, Manufacturer Part=MS2351, Name=MS2351, Number of Circuits=-, Operating Temperature=-, Output Type=-, Slew Rate（SR）=-, Supplier=LCSC, Supplier Footprint=MSOP-8, Supplier Part=C1509084, Supply Voltage（Single）=-, Symbol=MS2351, Voltage - Input Offset（Vos）=-
U16 U21: "数控衰减器"
U17: library part 功分器_研通, "工作频率 800-1000 MHz"
U22 U23: library part MXD8625C
U25 U28: JLCPCB Part Class="Extended Part", Manufacturer=silergy(矽力杰), Add into BOM=yes, Convert to PCB=yes, Datasheet=https://atta.szlcsc.com/upload/public/pdf/source/20220628/778B77D6DFC0D9CB89BA787A0CD3FE92.pdf, Device=SY8121BABC, LCSC Part Name=SY8121BABC, Manufacturer Part=SY8121BABC, Name=SY8121BABC, Supplier=LCSC, Supplier Footprint=SOT-23-6, Supplier Part=C3014423, Symbol=SY8121BABC
U26 U27 U29 U30 U31 U32 U33 U34 U35 U36: library part sgm2036
Y1 Y2: library part "XTAL 3225", PCB DECAL=3225, Source_Path="E:\LI LELE\DESIGN KIT\DESIGN KIT_ESP8089_DEMO\ESP8089_DEMO.DSN"

## Free pads (board coordinates)
  rect 0.6x2.2 hole 0.6 slot 2 at 90 deg mask+0: 1(5.65,2.424) 1(5.65,61.475) 1(70.45,2.448) 1(70.45,27.602) 1(70.45,61.475)
  rect 2.2x0.6 hole 0.6 slot 2 at 0 deg mask+0: 1(6.46,1.651) 1(6.46,62.2) 1(28.526,1.651) 1(28.526,62.2) 1(50.445,1.651) 1(50.445,62.2) 1(69.7,1.651) 1(69.7,62.2)
  rect 0.6x1.6 hole 0.4 slot 1.3 at 90 deg mask+0: 1(59.634,36.934) 1(59.64,8.954) 1(68.451,8.939) 1(68.451,36.934)
  rect 0.6x2.2 hole 0.4 slot 1.9 at 90 deg mask+0: 1(59.637,28.046) 1(59.643,19.158) 1(68.44,28.046) 1(68.447,19.158)
  rect 1.6x0.6 hole 0.4 slot 1.3 at 0 deg mask+0: 1(60.134,37.434) 1(60.14,8.454) 1(67.951,8.439) 1(67.951,37.434)

## Via types
v1: diameter 0.4, hole 0.25, Top Layer to Bottom Layer, tented both sides, 1555 vias
v2: diameter 0.4, hole 0.25, Top Layer to Bottom Layer, tented top, 149 vias
v3: diameter 0.35, hole 0.25, Top Layer to Bottom Layer, tented both sides, 117 vias
v4: diameter 0.4, hole 0.25, Top Layer to Bottom Layer, 32 vias
v5: diameter 0.4, hole 0.3, Top Layer to Bottom Layer, tented both sides, 12 vias
v6: diameter 0.4, hole 0.3, Top Layer to Bottom Layer, 4 vias
v7: diameter 2.8, hole 2.1, Top Layer to Bottom Layer, 4 vias

## Nets (pads, with @x,y where several pads share a name; then routed paths per layer and width w, separated by ;. In a path a pad name is that pad's centre, name@x,y a point inside that pad or via, vN(x,y) a via of type N, cw(c..) or ccw(c..) an arc to the next point about the centre after c; other vN are vias at no path point)
ADP_IN: C189.1 C190.1 C198.1 C199.1 F1.2 R27.1 U25.4 U25.5 U28.4 U28.5 | length 105.9
  Top Layer w0.4: v3(7.838,58.483) 8.856,58.483 8.895,58.444 C189.1@8.997,58.546 ; v3(52.432,56.801) R27.1@52.432,58.376
  Signal Layer 1 w0.5: 7.805,46.406 7.805,43.264 2.591,38.049 2.591,13.918 2.884,13.625 v3(9.625,13.625) ; v3@7.82,58.465 7.82,46.326 42.296,46.326 52.432,56.462 v3(52.432,56.801)
AGND: C4.2 L3.2 U1.11 | length 2.6
  Top Layer w0.2: L3.2@15.236,7.897 C4.2@15.97,7.896 17.143,7.897 17.242,7.996 U1.11@17.242,8.506
AMP_IN: C24.1 C27.2 C54.2 L15.2 U4.11 | length 69.5
  Top Layer w0.15: U4.11@20.657,27.815 20.657,28.147 21.162,28.652 C54.2@21.162,29.196 ; C27.2@46.079,8.536 46.079,8.666 48.645,8.666 ; L15.2@48.626,11.329 48.626,8.685 48.645,8.666 ; C24.1@50.486,7.72 50.536,7.77 50.536,8.635 v3(50.534,8.637) 50.504,8.666 48.645,8.666
  Signal Layer 3 w0.15: v3(20.657,28.101) 20.657,28.047 20.532,27.922 20.532,16.118 20.898,15.752 24.8,15.752 25.675,14.877 25.675,3.032 25.905,2.801 42.192,2.801 42.676,3.286 42.676,8.036 43.277,8.637 v3(50.534,8.637)
AMP_IP: C18.2 C24.2 C53.2 L8.2 U4.12 | length 69.8
  Top Layer w0.15: v3(20.157,28.101) 20.157,28.168 20.738,28.748 20.738,29.975 20.837,30.073 21.135,30.073 C53.2@21.16,30.097 ; C18.2@46.078,6.03 46.078,5.939 48.575,5.939 ; L8.2@48.626,3.264 48.575,3.316 48.575,5.939 ; C24.2@50.486,6.87 50.55,6.805 50.55,5.974 50.529,5.974 v3(50.519,5.985) 50.473,5.939 48.575,5.939
  Signal Layer 3 w0.15: v3(20.157,28.101) 20.119,28.063 19.977,28.063 19.45,27.536 19.45,15.33 19.815,14.965 23.953,14.965 24.75,14.168 24.75,2.829 25.131,2.448 42.192,2.448 43.057,3.313 43.057,5.623 43.419,5.985 v3(50.519,5.985)
AMP_QN: C42.1 C44.2 C46.2 L23.2 U4.2 | length 44.6
  Top Layer w0.15: C46.2@24.949,29.196 25.096,29.049 25.096,28.229 25.157,28.168 U4.2@25.157,27.815 ; C42.1@33.289,2.994 C44.2@34.062,2.994 34.55,2.506 37.878,2.506 38.046,2.673 L23.2@38.046,4.794 37.219,4.794 v3(37.208,4.806)
  Signal Layer 2 w0.15: v3(25.157,28.101) v3(29.292,28.101)
  Signal Layer 3 w0.15: v3(29.292,28.101) 29.292,5.186 29.672,4.806 v3(37.208,4.806)
AMP_QP: C36.2 C42.2 C45.2 L18.2 U4.3 | length 42.3
  Top Layer w0.15: U4.3@24.657,27.815 24.657,28.678 24.541,28.794 24.541,29.685 C45.2@24.949,30.093 ; v3(28.325,4.861) 28.318,4.853 L18.2@27.398,4.853 27.398,2.611 27.5,2.508 31.14,2.508 C36.2@31.637,3.005 31.649,2.994 C42.2@32.439,2.994
  Signal Layer 3 w0.15: v3(24.657,28.101) 24.657,27.18 24.656,27.179 24.838,26.997 27.391,26.997 27.688,26.7 27.688,24.885 27.688,24.289 cw(c27.359,24.289) 27.359,23.96 27.018,23.96 ccw(c27.018,23.631) 26.689,23.631 ccw(c27.018,23.631) 27.018,23.302 27.52,23.302 cw(c27.52,22.973) 27.849,22.973 cw(c27.52,22.973) 27.52,22.644 27.018,22.644 ccw(c27.018,22.315) 26.689,22.315 ccw(c27.018,22.315) 27.018,21.986 27.52,21.986 cw(c27.52,21.657) 27.849,21.657 cw(c27.52,21.657) 27.52,21.328 27.018,21.328 ccw(c27.018,20.999) 26.689,20.999 ccw(c27.018,20.999) 27.018,20.67 27.359,20.67 cw(c27.359,20.341) 27.688,20.341 27.688,20.266 27.688,5.191 28.018,4.861 v3(28.325,4.861)
ATTN1_D0: C129.1 C161.1 U16.1 U21.1 U37.15 | length 62.4
  Top Layer w0.1: U21.1@38.732,38.728 38.732,38.861 38.815,38.944 40.293,38.944 v3(40.315,38.966) 40.345,38.966 40.775,39.396 C161.1@40.775,39.419 ; C161.1@40.775,39.471 C161.1@40.775,39.419 ; U37.15@43.364,23.894 45.544,23.894 45.775,24.125 45.775,37.175 43.949,39.001 41.193,39.001 C161.1@40.775,39.419 ; U16.1@64.153,23.283 64.153,24.052 64.385,24.284 v3(65.795,24.284) 66.254,24.284 C129.1@66.257,24.281
  Signal Layer 2 w0.1: v3@40.342,38.966 43.017,38.966 45.782,36.201 45.782,34.278 ; 45.782,34.251 45.782,29.41 45.816,29.376 45.832,29.376 46.457,28.751 50.282,28.751 54.432,24.601 65.478,24.601 v3(65.795,24.284)